# Altium PCB stabilizer_current_sense.PcbDoc (part 1 of 3)
Units mm, origin at the board's own origin, x right, y up, seen from the top; angles counter-clockwise.
Board outline 113.55 x 100 mm, 4 copper layers (Top, L2, L3, Bottom Layer), stack 1.579 mm thick; 206 components, 77 nets, 530 pads, 258 vias.
Unrouted connection lines stored in the file: 53.
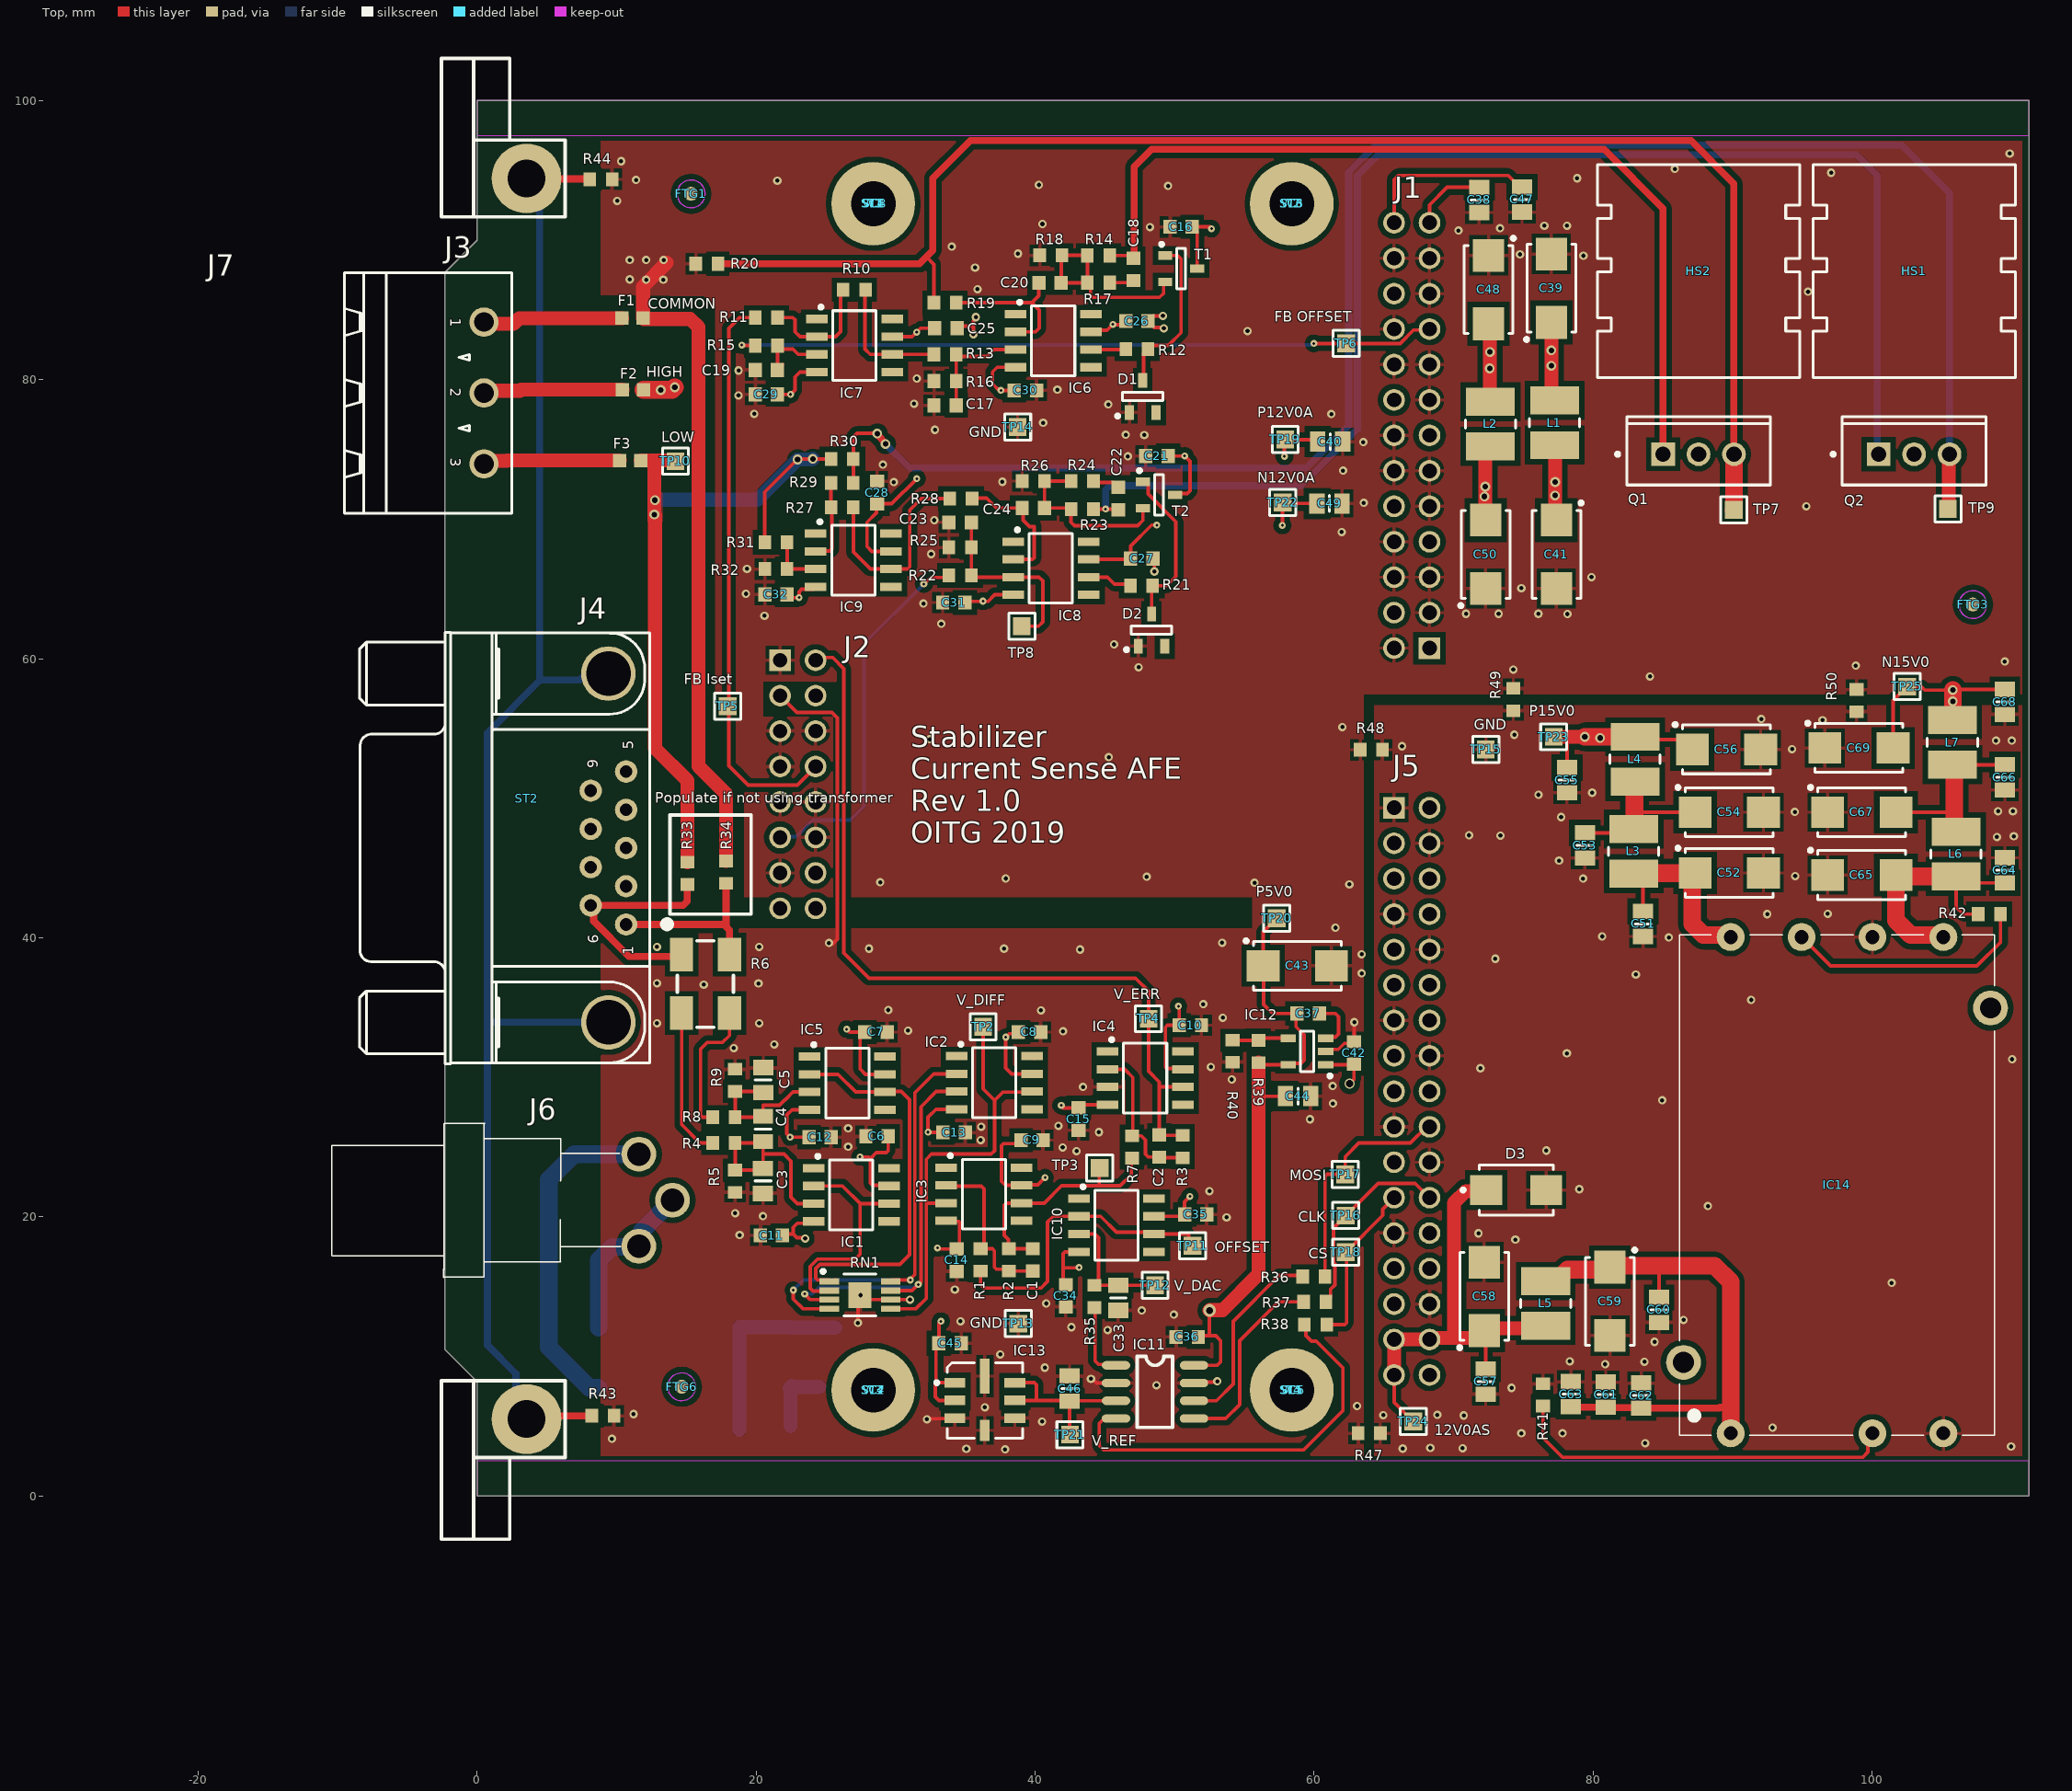
[diagram p0: Top view]
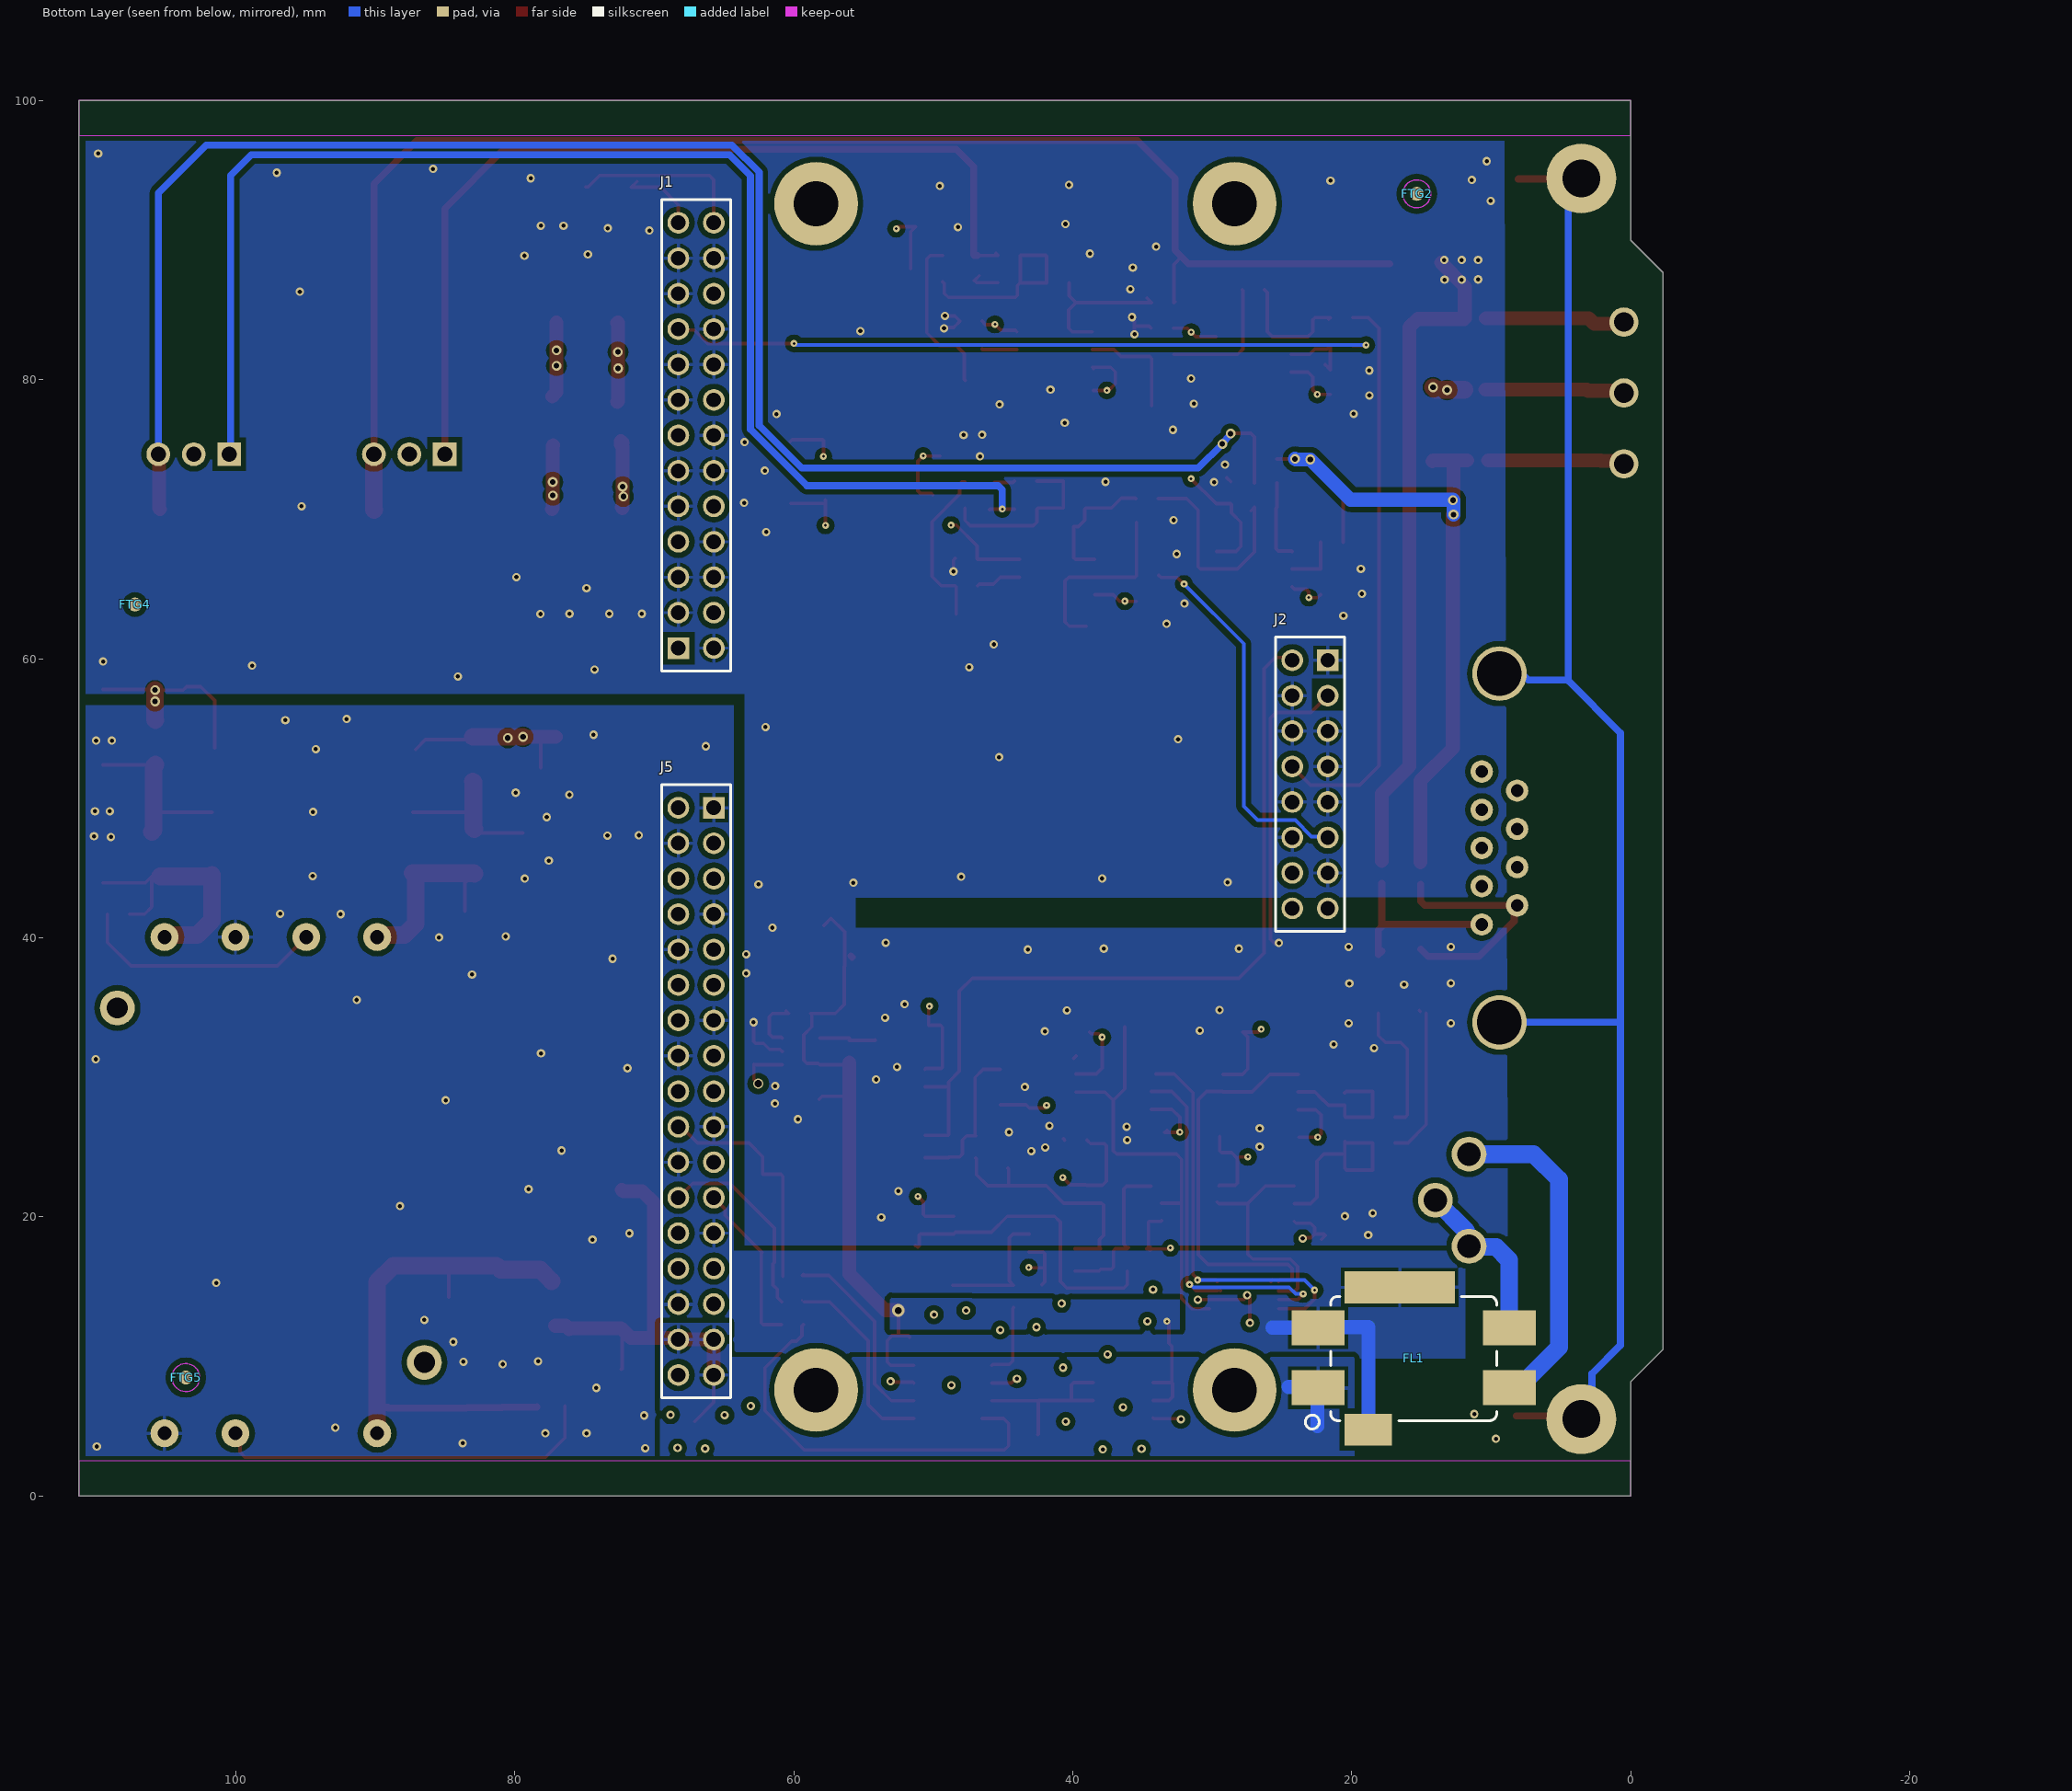
[diagram p1: Bottom Layer view, seen from below]
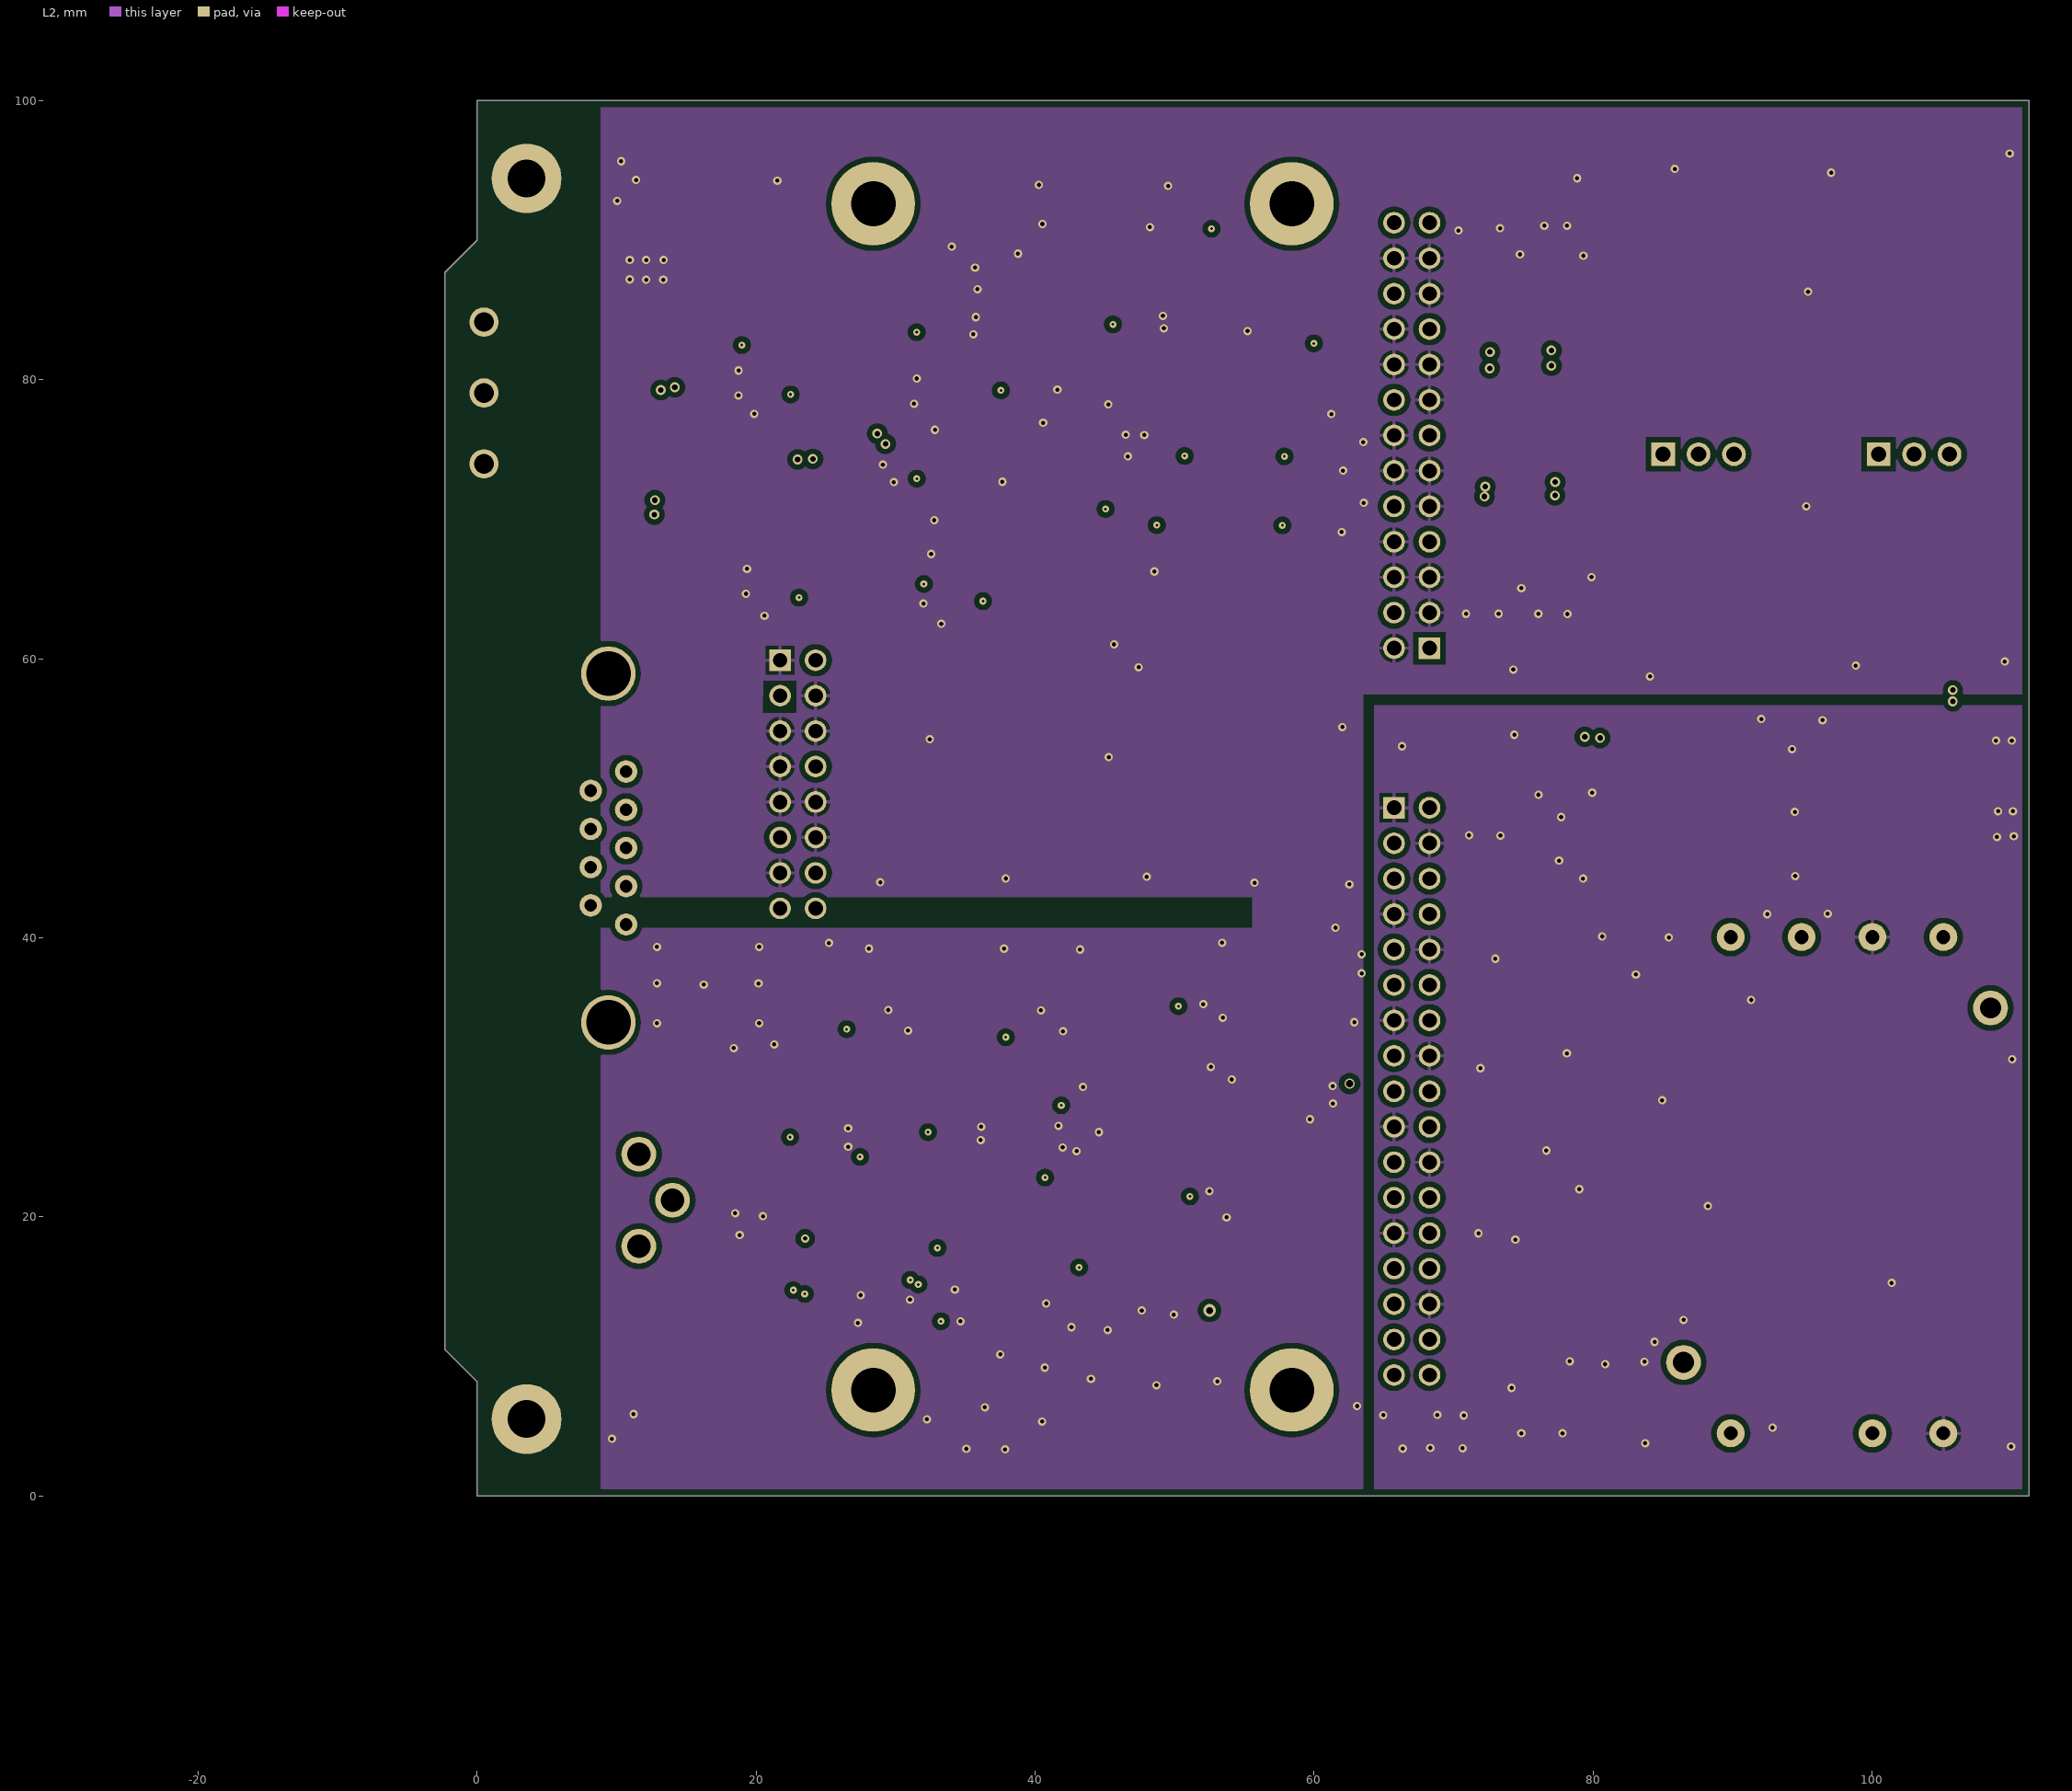
[diagram p2: L2]
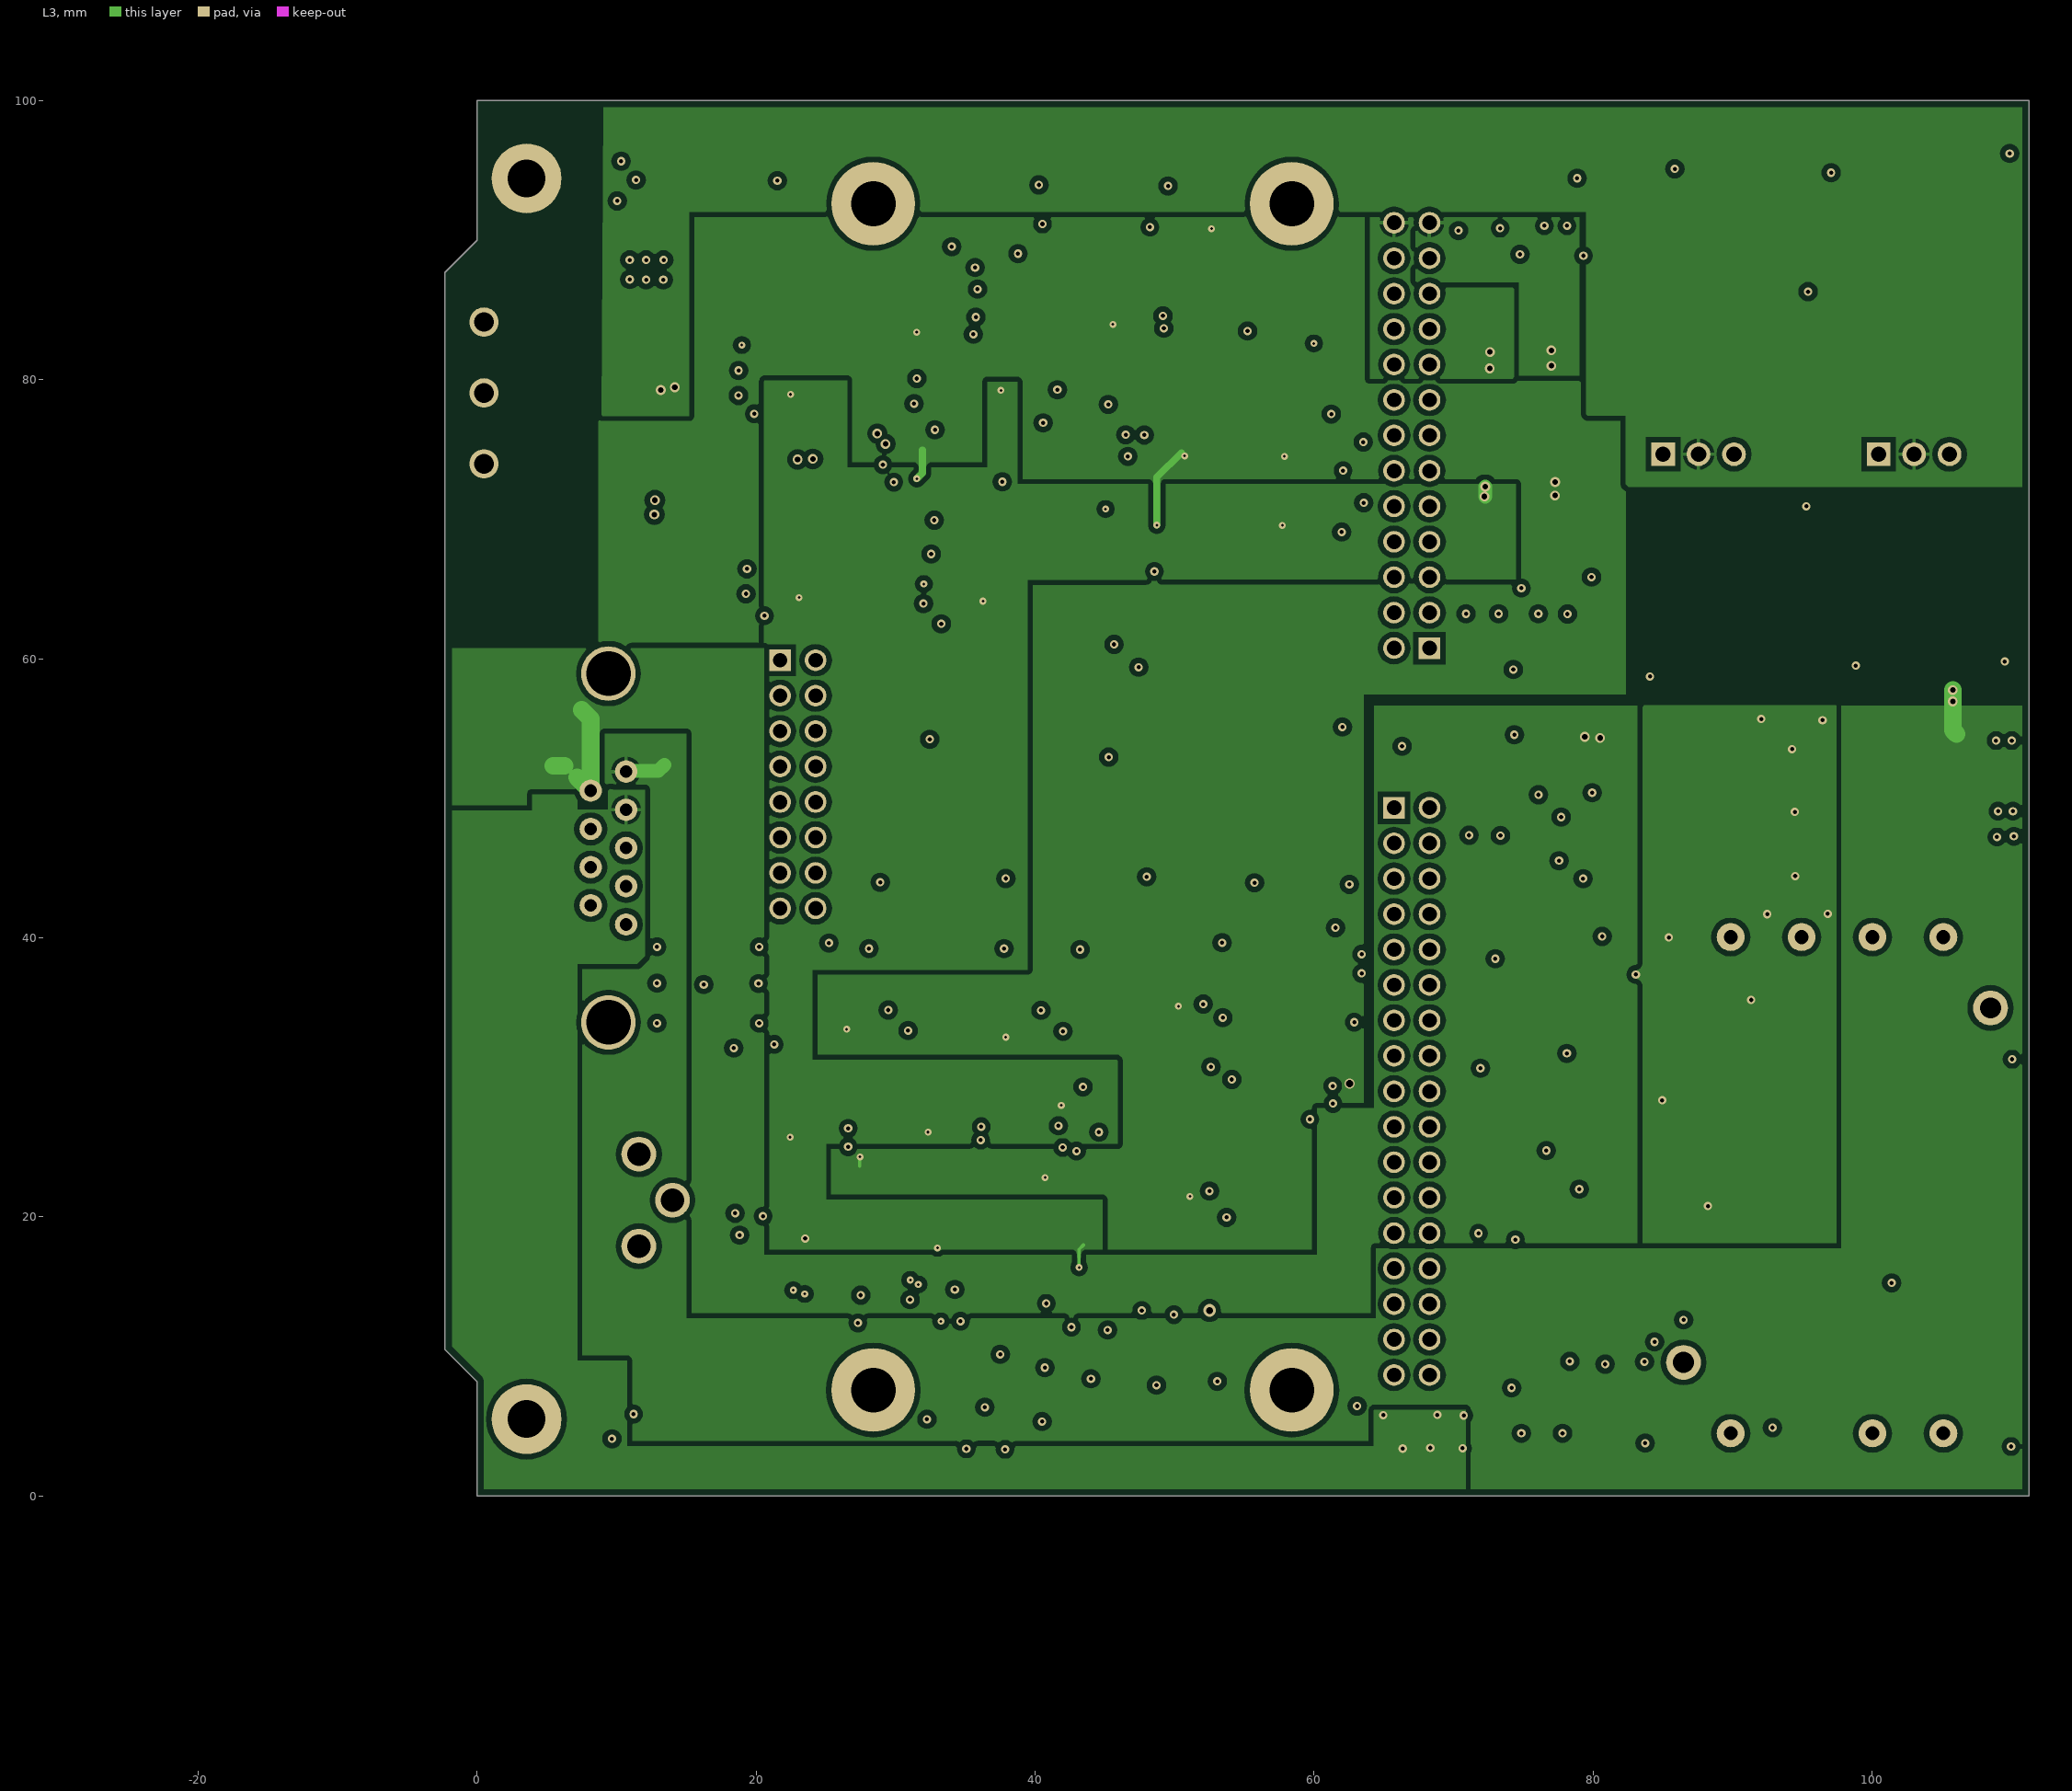
[diagram p3: L3]

## Layer stack, top to bottom
Top Solder: solder mask 0.0102, Solder Resist, Dk 3.5
Top: signal copper 0.0356
Dielectric1: core 0.18, FR-4, Dk 4.2
L2: signal copper 0.036
Dielectric3: prepreg 1.076, PP-015, Dk 4.2
L3: signal copper 0.036
Dielectric2: core 0.18, FR-4, Dk 4.2
Bottom Layer: signal copper 0.0356
Bottom Solder: solder mask 0.0102, Solder Resist, Dk 3.5

## Board outline
0,8.2 -2.3,10.5 -2.3,87.675 0,89.975 0,100 111.25,100 111.25,0 0,0

## Design rules (kind name [scope] priority, off if disabled: settings)
AcuteAngle [All] p1: minimum=6.00000000000000E+0001 checktracksonly=FALSE
BoardOutlineClearance BoardOutlineClearance_silk [(OnLayer('Top Overlay') OR OnLayer('Bottom Overlay'))] p1: gap=0 ignorepadtopadclearanceinfootprint=FALSE
BoardOutlineClearance BoardOutlineClearance_keepout [Keepout] p2: gap=0 ignorepadtopadclearanceinfootprint=FALSE
BoardOutlineClearance [All] p3: gap=0.254 ignorepadtopadclearanceinfootprint=FALSE except(0: Arc-SplitContinuation Track-SplitContinuation SMDPad-SplitContinuation THPad-SplitContinuation Via-SplitContinuation Fill-SplitContinuation Poly-SplitContinuation Region-SplitContinuation Text-SplitContinuation; 0.5: Arc-OutlineEdge Track-OutlineEdge SMDPad-OutlineEdge THPad-OutlineEdge Via-OutlineEdge Fill-OutlineEdge Poly-OutlineEdge Region-OutlineEdge Text-OutlineEdge)
Clearance outline_edge [OnLayer('Top Overlay')] p1: gap=-25.4 ignorepadtopadclearanceinfootprint=FALSE
Clearance Clearance_DIFF [(InDifferentialPairClass('All Differential Pairs'))] p2: gap=0.127 ignorepadtopadclearanceinfootprint=FALSE except(0.254: Arc-Poly Track-Poly SMDPad-Poly THPad-Poly Via-Poly Fill-Poly Poly-Poly Poly-Region Poly-Text Poly-Hole)
Clearance [All] p3: gap=0.127 ignorepadtopadclearanceinfootprint=FALSE except(0.381: Arc-Poly Track-Poly SMDPad-Poly THPad-Poly Via-Poly Fill-Poly Poly-Poly Poly-Region Poly-Text Poly-Hole)
HoleSize [All] p1: absolutevalues=TRUE maxlimit=3.81 minlimit=0.2 maxpercent=80.000 minpercent=20.000
HoleToHoleClearance [All] p1: gap=0.025 allowstackedmicrovias=TRUE
MinimumSolderMaskSliver [All] p1: minsoldermaskwidth=0
PlaneClearance PlaneClearance_outer [OnOutside] p1: clearance=0.254
PlaneClearance [All] p2: clearance=0.5
PlaneConnect [All] p1: pad.planeconnectstyle=Relief pad.reliefexpansion=0.508 pad.reliefentries=4 pad.reliefconductorwidth=0.254 pad.reliefairgap=0.254 via.planeconnectstyle=Direct via.reliefexpansion=0.508 via.reliefentries=4 via.reliefconductorwidth=0.254 via.reliefairgap=0.254
PolygonConnect PolygonConnect_pad [(InPadClass('All Pads'))] p1: connectstyle=Relief reliefconductorwidth=0.254 reliefentries=4 polygonreliefangle="90 Angle" airgapwidth=0.254
PolygonConnect [All] p2: connectstyle=Direct reliefconductorwidth=0.254 reliefentries=4 polygonreliefangle="90 Angle" airgapwidth=0.254
RoutingVias [All] p1: holewidth=0.2 width=0.5 viastyle="Through Hole" minholewidth=0.2 minwidth=0.5 maxholewidth=0.711 maxwidth=1.27
SilkToSolderMaskClearance [IsPad] p1: minsilkscreentomaskgap=0 clearancetoexposedcopper=TRUE
SolderMaskExpansion [All] p1: expansion=0.051
UnRoutedNet [All] p1: checkbadconnections=TRUE
Width [All] p1: maxlimit=1.27 minlimit=0.127 preferedwidth=0.127 minimp=50.000000 maximp=50.000000 favimp=50.000000
23 further rules are at their usual default settings.

## Classes and differential pairs
component class U_mechanics: FTG1 FTG2 FTG3 FTG4 FTG5 FTG6 J7 R43 R44 SC1 SC2 SC3 SC4 SC5 SC6 SC7 SC8 ST1 ST2 ST3 ST4 ST5 W1 W2 W3 W4
component class U_frontend: C1 C2 C3 C4 C5 C6 C7 C8 C9 C10 C11 C12 C13 C14 C15 IC1 IC2 IC3 IC4 IC5 R1 R2 R3 R4 R5 R6 R7 R8 R9 RN1 TP2 TP3 TP4
component class U_power_supplies: C37 C38 C39 C40 C41 C42 C43 C44 C45 C46 C47 C48 C49 C50 C51 C52 C53 C54 C55 C56 C57 C58 C59 C60 C61 C62 C63 C64 C65 C66 C67 C68 C69 IC12 IC13 IC14 L1 L2 L3 L4 L5 L6 L7 p15v0 R39 R40 R41 R42 R47 R48 R49 R50 TP19 TP20 TP21 TP22 TP23 TP24 TP25
component class U_shunts: C16 C17 C18 C19 C20 C21 C22 C23 C24 C25 C26 C27 C28 C29 C30 C31 C32 D1 D2 FF_ISET_DIV HS1 HS2 IC6 IC7 IC8 IC9 Q1 Q2 R10 R11 R12 R13 R14 R15 R16 R17 R18 R19 R20 R21 R22 R23 R24 R25 R26 R27 R28 R29 R30 R31 R32 T1 T2 TP5 TP6 TP7 TP8 TP9
component class stabilizer_current_sense: C33 C34 C35 C36 D3 F1 F2 F3 FL1 IC10 IC11 J1 J2 J3 J4 J5 J6 R33 R34 R35 R36 R37 R38 TP10 TP11 TP12 TP13 TP14 TP15 TP16 TP17 TP18

## Components (designator, comment, footprint, x,y, rotation, side; value= is the part's Value field where it differs from the comment)
C1 "8.2pF" CAPC1608X87N 39.834,16.922 r90 top
C2 "43pF" CAPC1608X87N 48.9,25.079 r90 top
C3 "4.7nF" CAPC2012X95N 20.5,22.581 r90 top
C4 "47nF" CAPC2012X135N 20.5,26.302 r270 top
C5 "4.7nF" CAPC2012X95N 20.519,29.801 r270 top
C6 "100nF" CAPC1608X87N 28.669,25.779 r0 top
C7 "100nF" CAPC1608X87N 28.6,33.246 r180 top
C8 "100nF" CAPC1608X87N 39.6,33.246 r180 top
C9 "100nF" CAPC1608X87N 39.784,25.502 r180 top
C10 "100nF" CAPC1608X87N 51.131,33.735 r180 top
C11 "100nF" CAPC1608X87N 21.1,18.675 r0 top
C12 "100nF" CAPC1608X87N 24.592,25.714 r180 top
C13 "100nF" CAPC1608X87N 34.2,26.05 r180 top
C14 "100nF" CAPC1608X87N 34.379,16.9 r90 top
C15 "100nF" CAPC1608X87N 43.113,27.012 r90 top
C16 "100nF" CAPC1608X87N 50.465,90.942 r0 top
C17 "330pF" CAPC1608X87N 33.55,78.142 r0 top
C18 "4.7nF" CAPC1608X87N 47.05,87.892 r90 top
C19 "1uF" CAPC1608X87N 20.74,80.687 r0 top
C20 "15pF" CAPC1608X87N 41.07,86.925 r0 top
C21 "100nF" CAPC1608X87N 48.73,74.525 r0 top
C22 "4.7nF" CAPC1608X87N 45.961,71.475 r270 top
C23 "33nF" CAPC1608X87N 34.63,69.765 r0 top
C24 "15pF" CAPC1608X87N 39.875,70.8 r0 top
C25 "100nF" CAPC1608X87N 33.6,83.687 r180 top
C26 "100nF" CAPC1608X87N 47.3,84.187 r180 top
C27 "100nF" CAPC1608X87N 47.65,67.175 r180 top
C28 "100nF" CAPC1608X87N 28.681,71.9 r270 top
C29 "100nF" CAPC1608X87N 20.74,78.937 r0 top
C30 "100nF" CAPC1608X87N 39.308,79.225 r180 top
C31 "100nF" CAPC1608X87N 34.175,64.025 r0 top
C32 "100nF" CAPC1608X87N 21.426,64.598 r0 top
C33 "10uF" CAPC2012X95N 45.964,14.2 r90 top
C34 "100nF" CAPC1608X87N 42.2,14.343 r270 top
C35 "100nF" CAPC1608X87N 51.514,20.177 r180 top
C36 "100nF" CAPC1608X87N 50.9,11.4 r0 top
C37 "10nF" CAPC1608X87N 59.575,34.575 r180 top
C38 "10uF" CAPC2012X95N 71.825,92.875 r90 top
C39 "10uF" CAPMP6032X280N 77,86.55 r90 top
C40 "10uF" CAPC2012X95N 61.15,75.55 r180 top
C41 "10uF" CAPMP6032X280N 77.36,67.48 r270 top
C42 "100nF" CAPC1608X87N 62.85,31.75 r270 top
C43 "10uF" CAPMP6032X280N 58.8,38 r0 top
C44 "10uF" CAPC2012X95N 58.85,28.65 r180 top
C45 "100nF" CAPC1608X87N 33.905,10.95 r180 top
C46 "10uF" CAPC2012X95N 42.475,7.7 r270 top
C47 "10uF" CAPC2012X95N 74.9,92.9 r90 top
C48 "10uF" CAPMP6032X280N 72.5,86.45 r270 top
C49 "10uF" CAPC2012X95N 61.1,71.125 r180 top
C50 "10uF" CAPMP6032X280N 72.29,67.48 r90 top
C51 "10uF" CAPC2012X95N 83.573,41 r90 top
C52 "10uF" CAPMP6032X280N 89.75,44.65 r0 top
C53 "10uF" CAPC2012X95N 79.4,46.622 r90 top
C54 "10uF" CAPMP6032X280N 89.75,49 r0 top
C55 "10uF" CAPC2012X95N 78.123,51.3 r90 top
C56 "10uF" CAPMP6032X280N 89.55,53.5 r0 top
C57 "10uF" CAPC2012X95N 72.3,8.2 r90 top
C58 "10uF" CAPMP6032X280N 72.2,14.308 r90 top
C59 "10uF" CAPMP6032X280N 81.2,13.95 r270 top
C60 "10uF" CAPC2012X95N 84.72,13.342 r90 top
C61 "10uF" CAPC2012X95N 80.9,7.262 r270 top
C62 "10uF" CAPC2012X95N 83.442,7.2 r270 top
C63 "10uF" CAPC2012X95N 78.4,7.3 r270 top
C64 "10uF" CAPC2012X95N 109.5,44.835 r270 top
C65 "10uF" CAPMP6032X280N 99.25,44.5 r0 top
C66 "10uF" CAPC2012X95N 109.5,51.5 r90 top
C67 "10uF" CAPMP6032X280N 99.25,49 r0 top
C68 "10uF" CAPC2012X95N 109.5,56.9 r90 top
C69 "10uF" CAPMP6032X280N 99.05,53.6 r0 top
D1 "BAT54" SOT95P240X130-3N 47.715,78.792 r90 top
D2 "BAT54" SOT95P240X130-3N 48.35,62.05 r90 top
D3 "SMBJ12A" DIOM5336X265N 74.48,21.93 r0 top
F1 "500mA-50V" FUSC1608X55N 11.15,84.4 r180 top
F2 "500mA-50V" FUSC1608X55N 11.175,79.275 r180 top
F3 "500mA-50V" FUSC1608X55N 10.975,74.2 r180 top
FL1 "10A/50VDC" FIL_MURATA_BNX02 15.567,9.856 r0 bottom
FTG1 "Use only in PCB" FIDUCIAL_TOP_C100-200#1 15.34,93.31 r90 top
FTG2 "Use only in PCB" FIDUCIAL_TOP_C100-200#1 15.34,93.31 r90 bottom
FTG3 "Use only in PCB" FIDUCIAL_TOP_C100-200#1 107.21,63.88 r90 top
FTG4 "Use only in PCB" FIDUCIAL_TOP_C100-200#2 107.21,63.88 r90 top
FTG5 "Use only in PCB" FIDUCIAL_TOP_C100-200#1 103.57,8.49 r90 bottom
FTG6 "Use only in PCB" FIDUCIAL_TOP_C100-200#1 14.67,7.83 r90 top
HS1 "Heat Sink No Pad" "HSINK_FISCHER_FK 242 SA 220 O_h" 103,87.775 r0 top
HS2 "Heat Sink No Pad" "HSINK_FISCHER_FK 242 SA 220 O_h" 87.55,87.775 r0 top
IC1 "LT1007CS8#PBF" SOIC127P600X175-8N 26.828,21.587 r0 top
IC2 "LT1007CS8#PBF" SOIC127P600X175-8N 37.079,29.617 r0 top
IC3 "LT1007CS8#PBF" SOIC127P600X175-8N 36.329,21.627 r0 top
IC4 "LT1007CS8#PBF" SOIC127P600X175-8N 47.891,29.951 r0 top
IC5 "LT1007CS8#PBF" SOIC127P600X175-8N 26.543,29.587 r0 top
IC6 "LT1007CS8#PBF" SOIC127P600X175-8N 41.3,82.787 r0 top
IC7 "LT1007CS8#PBF" SOIC127P600X175-8N 27.05,82.437 r0 top
IC8 "LT1007CS8#PBF" SOIC127P600X175-8N 41.13,66.48 r0 top
IC9 "LT1007CS8#PBF" SOIC127P600X175-8N 26.976,67.058 r0 top
IC10 "LT1007CS8#PBF" SOIC127P600X175-8N 45.834,19.407 r0 top
IC11 "AD5541" so-8 45.8,9.367 r0 top
IC12 "LT1761ES5-BYP#TRMPBF" SOT95P280X100-5N 59.482,31.857 r180 top
IC13 "LTC6655BHLS8-2.5" LT_LS8 36.4,6.853 r0 top
IC14 "CC10-1212DF-E" CC10-1212DF-E 86.475,9.575 r90 top
J1 "ESW-108-23-L-D" ESW-113-23-L-D 67,76 r90 bottom locked
J2 "ESW-108-23-L-D" ESW-108-23-L-D 23,51 r270 bottom locked
J3 "MSTBA" PHOENIX_1757255 0.5,79.045 r270 top
J4 "D-Sub 9F" FCI_D09S13A4GV00LF 9.42,46.435 r90 top locked
J5 "ESW-108-23-L-D" ESW-117-23-L-D 67,29 r270 bottom locked
J6 "Jack" SWITCHCRAFT_L712RA 11.6,24.5 r0 top
J7 "Family" PHOENIX_1757022 -19.5,86.675 r270 top
L1 "10uH" IND_MURATA-PS_8400 77.23,76.9 r270 top
L2 "10uH" IND_MURATA-PS_8400 72.639,76.813 r270 top
L3 "10uH" IND_MURATA-PS_8400 82.9,46.2 r90 top
L4 "10uH" IND_MURATA-PS_8400 83,52.8 r90 top
L5 "10uH" IND_MURATA-PS_8400 76.6,13.8 r90 top
L6 "10uH" IND_MURATA-PS_8400 106,46 r90 top
L7 "10uH" IND_MURATA-PS_8400 105.75,54 r90 top
Q1 "TIP29A" ONSC-TO-220-3-221A-09 87.55,74.65 r90 top
Q2 "TIP29A" ONSC-TO-220-3-221A-09 103,74.65 r90 top
R1 "1k" RESC1608X55N 36.094,16.922 r90 top
R2 "100k" RESC1608X55N 38.124,16.922 r90 top
R3 "20k" RESC1608X55N 50.581,25.041 r90 top
R4 "16" RESC1608X55N 17.7,25.301 r0 top
R5 "10k" RESC1608X55N 18.5,22.56 r90 top
R6 "Y160710R0000D9R" VCS1625Z 14.67,38.79 r270 top
R7 "1k" RESC1608X55N 46.943,25.012 r90 top
R8 "16" RESC1608X55N 17.7,27.15 r0 top
R9 "10k" RESC1608X55N 18.5,29.791 r270 top
R10 "470" RESC1608X55N 27.05,86.437 r0 top
R11 "10k" RESC1608X55N 20.74,84.437 r0 top
R12 "1k" RESC1608X55N 47.3,82.187 r0 top
R13 "10k" RESC1608X55N 33.55,81.802 r0 top
R14 "470" RESC1608X55N 44.55,88.892 r0 top
R15 "10k" RESC1608X55N 20.74,82.437 r0 top
R16 "470" RESC1608X55N 33.55,79.892 r0 top
R17 "0" RESC1608X55N 44.55,86.948 r0 top
R18 "470" RESC1608X55N 41.125,88.9 r0 top
R19 "1k" RESC1608X55N 33.55,85.512 r180 top
R20 "2" RESC1608X55N 16.475,88.3 r0 top
R21 "1k" RESC1608X55N 47.63,65.225 r0 top
R22 "24k" RESC1608X55N 34.63,65.975 r0 top
R23 "470" RESC1608X55N 43.38,70.725 r0 top
R24 "0" RESC1608X55N 43.38,72.725 r0 top
R25 "470" RESC1608X55N 34.63,67.975 r0 top
R26 "470" RESC1608X55N 39.88,72.725 r0 top
R27 "1k" RESC1608X55N 26.176,70.848 r180 top
R28 "1k" RESC1608X55N 34.68,71.475 r180 top
R29 "1k" RESC1608X55N 26.176,72.598 r0 top
R30 "10" RESC1608X55N 26.176,74.3 r0 top
R31 "1k" RESC1608X55N 21.426,68.348 r180 top
R32 "1k" RESC1608X55N 21.426,66.423 r0 top
R33 "0" RESC1608X55N 15.075,44.626 r270 top
R34 "0" RESC1608X55N 17.85,44.7 r270 top
R35 "0" RESC1608X55N 44.243,14.298 r90 top
R36 "0" RESC1608X55N 59.975,15.725 r180 top
R37 "0" RESC1608X55N 60.05,13.915 r180 top
R38 "0" RESC1608X55N 60.1,12.275 r0 top
R39 "6k2" RESC1608X55N 56.025,31.85 r270 top
R40 "2k" RESC1608X55N 54.15,31.875 r90 top
R41 "0" RESC1608X55N 76.4,7.25 r270 top
R42 "0" RESC1608X55N 108.394,41.7 r0 top
R43 "0" RESC1608X55N 9.025,5.75 r180 top
R44 "0" RESC1608X55N 8.886,94.35 r180 top
R47 "0" RESC1608X55N 63.95,4.495 r0 top
R48 "0" RESC1608X55N 64.1,53.475 r0 top
R49 "0" RESC1608X55N 74.275,57.075 r270 top
R50 "0" RESC1608X55N 98.875,57 r270 top
RN1 "1k" SOP65P490X110-9N-R168X188 27.455,14.4 r0 top
SC1 "SCREW_M3_CAP_8mm" SCREW_M3_CAP_8mm 58.4,7.6 r0 top
SC2 "SCREW_M3_CAP_8mm" SCREW_M3_CAP_8mm 28.4,7.6 r0 top
SC3 "SCREW_M3_CAP_8mm" SCREW_M3_CAP_8mm 58.4,92.6 r0 top
SC4 "SCREW_M3_CAP_8mm" SCREW_M3_CAP_8mm 28.4,92.6 r0 top
SC5 "SCREW_M3_CAP_8mm" SCREW_M3_CAP_8mm 58.516,7.6 r180 top
SC6 "SCREW_M3_CAP_8mm" SCREW_M3_CAP_8mm 58.4,92.6 r0 top
SC7 "SCREW_M3_CAP_8mm" SCREW_M3_CAP_8mm 28.4,7.6 r0 top
SC8 "SCREW_M3_CAP_8mm" SCREW_M3_CAP_8mm 28.516,92.6 r0 top
ST1 "M3 8mm" R30-1001802 28.4,92.6 r180 top
ST2 "SCHROFF_PANEL_3U_4HP_EMI" SCHROFF_PANEL_3HP_4U 3.556,5.512 r0 top locked
ST3 "M3 8mm" R30-1001802 58.4,92.6 r180 top
ST4 "M3 8mm" R30-1001802 28.4,7.6 r180 top
ST5 "M3 8mm" R30-1001802 58.4,7.6 r180 top
T1 "BC846B" SOT95P230X110-3N 50.465,87.942 r0 top
T2 "BC846B" SOT95P230X110-3N 48.88,71.725 r0 top
TP2 "Test Point" TPS127 36.276,33.625 r0 top
TP3 "Test Point" TPS127 44.637,23.5 r0 top
TP4 "Test Point" TPS127 48.133,34.2 r0 top
TP5 "Test Point" TPS127 17.975,56.6 r0 top
TP6 "Test Point" TPS127 62.3,82.591 r0 top
TP7 "Test Point" TPS127 90.075,70.675 r0 top
TP8 "Test Point" TPS127 39.05,62.325 r90 top
TP9 "Test Point" TPS127 105.425,70.725 r90 top
TP10 "Test Point" TPS127 14.225,74.15 r90 top
TP11 "Test Point" TPS127 51.287,17.941 r90 top
TP12 "Test Point" TPS127 48.6,15.098 r90 top
TP13 "Test Point" TPS127 38.79,12.357 r90 top
TP14 "Test Point" TPS127 38.75,76.6 r90 top
TP15 "Test Point" TPS127 72.303,53.5 r90 top
TP16 "Test Point" TPS127 62.268,20.1 r90 top
TP17 "Test Point" TPS127 62.225,23.05 r90 top
TP18 "Test Point" TPS127 62.268,17.466 r90 top
TP19 "Test Point" TPS127 57.925,75.7 r0 top
TP20 "Test Point" TPS127 57.325,41.402 r90 top
TP21 "Test Point" TPS127 42.5,4.4 r0 top
TP22 "Test Point" TPS127 57.75,71.2 r0 top
TP23 "Test Point" TPS127 77.171,54.4 r90 top
TP24 "Test Point" TPS127 67.1,5.346 r90 top
TP25 "Test Point" TPS127 102.5,58 r90 top
W1 "washer_M3_6mm_0.8mm" washer_M3_6mm_0.8mm 28.4,92.6 r180 top
W2 "washer_M3_6mm_0.8mm" washer_M3_6mm_0.8mm 58.4,92.6 r180 top
W3 "washer_M3_6mm_0.8mm" washer_M3_6mm_0.8mm 28.4,7.6 r180 top
W4 "washer_M3_6mm_0.8mm" washer_M3_6mm_0.8mm 58.4,7.6 r180 top

## Footprints (in the part's own frame and the unit in brackets; to place one, negate y for a bottom-side part, rotate by r counter-clockwise, add the part's x,y. Pads: shape width x height; smd on the part's side, far side on the other; paste and mask are expansions set on the pad)
CAPC1608X87N [mm] "Chip Capacitor, Body 1.6x0.8mm IPC Medium Density"
  rect 0.95x1 smd: 1(-0.8,0) 2(0.8,0)
  body extent -0.87,-0.47 0.88,0.48, height 0.87
CAPC2012X95N [mm] "Chip Capacitor, Body 2.0x1.25mm, IPC Medium Density"
  rect 1.1x1.45 smd: 1(-0.9,0) 2(0.9,0)
  silkscreen extent 0,-0.58 0,0.58, body extent -1.05,-0.67 1.05,0.68, height 0.95
CAPC2012X135N [mm] "Chip Capacitor, Body 2.0x1.25mm, IPC Medium Density"
  rect 1.05x1.4 smd: 1(-0.9,0) 2(0.9,0)
  silkscreen extent 0,-0.58 0,0.58, body extent -1.05,-0.67 1.05,0.68, height 1.25
CAPMP6032X280N [mm] "Capacitor, Polarized, Molded  Body 6.0x3.2mm, IPC Medium Density"
  rect 2.35x2.25 smd: 1(-2.45,0) 2(2.45,0)
  silkscreen extent -3.8,-1.75 3.15,1.9, body extent -3.15,-1.75 3.15,1.75, height 2.8
CC10-1212DF-E [mm]
  round 2 hole 1: 1(-5.08,-3.38) 2(-5.08,-13.54) 3(-5.08,-18.62) 4(30.48,-18.62) 5(30.48,-13.54) 6(30.48,-8.46) 7(30.48,-3.38)
  round 2.5 hole 1.5: 8(0,0) 9(25.4,-22)
  silkscreen extent -5.23,-22.3 30.63,0.3, body extent -5.23,-22.3 30.63,0.3, height 8.5
DIOM5336X265N [mm] "DO-214-AA/SMB Diode, Molded Body; 5.34mm L X 3.625mm W X 2.65mm H, IPC Medium Density"
  rect 2.3x2.15 smd: 1(-2.15,0) 2(2.15,0)
  silkscreen extent -3.92,-1.8 2.65,1.8, body extent -2.7,-1.95 2.7,1.95, height 2.4
ESW-108-23-L-D [mm] "Samtec Elevated Socket, 2x8 Pins, Vertical, 2.54mm Pitch, Female, 13.59mm length"
  rect 1.55x1.55 hole 1.04: 1(-8.89,1.27)
  round 1.55 hole 1.04: 2(-8.89,-1.27) 3(-6.35,1.27) 4(-6.35,-1.27) 5(-3.81,1.27) 6(-3.81,-1.27) 7(-1.27,1.27) 8(-1.27,-1.27) 9(1.27,1.27) 10(1.27,-1.27) 11(3.81,1.27) 12(3.81,-1.27) 13(6.35,1.27) 14(6.35,-1.27) 15(8.89,1.27) 16(8.89,-1.27)
  silkscreen extent -10.54,-2.47 10.54,2.47, body extent -10.41,-2.54 10.41,2.54, height 14.84
ESW-113-23-L-D [mm] "Samtec Elevated Socket, 2x8 Pins, Vertical, 2.54mm Pitch, Female, 13.59mm length"
  rect 1.55x1.55 hole 1.04: 1(-15.24,1.27)
  round 1.55 hole 1.04: 2(-15.24,-1.27) 3(-12.7,1.27) 4(-12.7,-1.27) 5(-10.16,1.27) 6(-10.16,-1.27) 7(-7.62,1.27) 8(-7.62,-1.27) 9(-5.08,1.27) 10(-5.08,-1.27) 11(-2.54,1.27) 12(-2.54,-1.27) 13(0,1.27) 14(0,-1.27) 15(2.54,1.27) 16(2.54,-1.27) 17(5.08,1.27) 18(5.08,-1.27) 19(7.62,1.27) 20(7.62,-1.27) 21(10.16,1.27) 22(10.16,-1.27) 23(12.7,1.27) 24(12.7,-1.27) 25(15.24,1.27) 26(15.24,-1.27)
  silkscreen extent -16.89,-2.47 16.89,2.47, body extent -16.76,-2.54 16.76,2.54, height 14.84
ESW-117-23-L-D [mm] "Samtec Elevated Socket, 2x17 Pins, Vertical, 2.54mm Pitch, Female, 13.59mm length"
  rect 1.55x1.55 hole 1.04: 1(-20.32,1.27)
  round 1.55 hole 1.04: 2(-20.32,-1.27) 3(-17.78,1.27) 4(-17.78,-1.27) 5(-15.24,1.27) 6(-15.24,-1.27) 7(-12.7,1.27) 8(-12.7,-1.27) 9(-10.16,1.27) 10(-10.16,-1.27) 11(-7.62,1.27) 12(-7.62,-1.27) 13(-5.08,1.27) 14(-5.08,-1.27) 15(-2.54,1.27) 16(-2.54,-1.27) 17(0,1.27) 18(0,-1.27) 19(2.54,1.27) 20(2.54,-1.27) 21(5.08,1.27) 22(5.08,-1.27) 23(7.62,1.27) 24(7.62,-1.27) 25(10.16,1.27) 26(10.16,-1.27) 27(12.7,1.27) 28(12.7,-1.27) 29(15.24,1.27) 30(15.24,-1.27) 31(17.78,1.27) 32(17.78,-1.27) 33(20.32,1.27) 34(20.32,-1.27)
  silkscreen extent -21.97,-2.47 21.97,2.47, body extent -21.84,-2.54 21.84,2.54, height 14.84
FCI_D09S13A4GV00LF [mm] "Right Angled D-SUB 9 Female Contacts for PCB  with Harpoons and Female Screwlock (UNC4-40) and Elec. Continuity"
  round 1.6 hole 0.9: 1(-5.48,-1.27) 2(-2.74,-1.27) 3(0,-1.27) 4(2.74,-1.27) 5(5.48,-1.27) 6(-4.11,1.27) 7(-1.37,1.27) 8(1.37,1.27) 9(4.11,1.27)
  round 3.9 hole 3.2: 10(-12.495,0) 11(12.495,0)
  silkscreen extent -15.46,-4.45 15.45,17.85, body extent -15.45,-2.95 15.45,17.85, height 13.45
FIDUCIAL_TOP_C100-200#1 [mm] "Round Fiducial Target, Top Layer, 1.0mm, Top Solder 2.0mm, Keepout =2.0mm"
  round 1 smd paste-0.51 mask+0.5: FTG2(0,0)
  Top keep-out circle w0.1: c0,0 r1
FIDUCIAL_TOP_C100-200#2 [mm] "Round Fiducial Target, Top Layer, 1.0mm, Top Solder 2.0mm, Keepout =2.0mm"
  round 1 smd far side paste-0.51 mask+0.5: FTG2(0,0)
  Top keep-out circle w0.1: c0,0 r1
FIL_MURATA_BNX02 [mm] "Block Type EMIFIL LC Combined Type, BNX02* Series"
  rect 3.8x2.5 smd: 1(-6.85,2.1) 2(6.85,2.1) 3(-6.85,-2.2) 4(6.85,-2.2)
  rect 7.9x2.3 smd: 4(1,-5.1)
  rect 3.4x2.3 smd: 4(3.25,5.1)
  silkscreen extent -5.95,-4.45 7.77,5.05, body extent -6.05,-4.55 6.05,4.55, height 3.1
FUSC1608X55N [mm] "Chip Fuse, 2-Leads, Body 1.6mm x 0.8mm, IPC Medium Density"
  rect 0.95x0.95 smd: 1(-0.75,0) 2(0.75,0)
  body extent -0.85,-0.45 0.85,0.45, height 0.5
"HSINK_FISCHER_FK 242 SA 220 O_h" [mm] "TO-220 Heat Sink  Rth: 26°C/W - Horizontal Mount"
  silkscreen extent -7.25,-7.62 7.25,7.62, body extent -7.25,-7.62 7.25,7.62, height 12.71
IND_MURATA-PS_8400 [mm] "Miniature Surface Mount Power Inductors, 4.5mm L X 3.3mm W X 2.9mm H, MURATA 8400 Series"
  rect 2x3.5 smd: 1(-1.6,0) 2(1.6,0)
  silkscreen extent -0.3,-1.8 0.3,1.8, body extent -2.4,-1.8 2.4,1.8, height 2.9
LT_LS8 [mm] "8-pin ceramic LCC"
  rect 1.5x0.7 smd: 1(-2.15,1.27) 2(-2.15,0) 3(-2.15,-1.27) 5(2.15,-1.27) 6(2.15,0) 7(2.15,1.27)
  rect 0.7x1.5 smd: 4(0,-2.15)
  rect 0.7x2.5 smd: 8(0,1.742)
  silkscreen extent -3.57,-2.7 2.7,2.7, body extent -2.5,-2.5 2.5,2.5, height 1.45
ONSC-TO-220-3-221A-09 [mm] "FM, 3-Leads, Body 10.3x4.85mm, Pitch 2.54mm"
  rect 1.7x1.7 hole 1.1: 1(0,2.54)
  round 1.7 hole 1.1: 2(0,0) 3(0,-2.54)
  silkscreen extent -2.2,-5.15 2.7,5.92, body extent -2.18,-5.15 2.67,5.15, height 19.85
PHOENIX_1757022 [mm] "Phoenix Contact 5.08mm pitch terminal plug, 3 ways"
  body extent 0,-0.1 15.24,18.2, height 15.14
PHOENIX_1757255 [mm] "PHOENIX MSTBA Serie, Pitch 5.08mm, 12A, 250V, 3 Positions Header"
  round 2.1 hole 1.4: 1(-5.08,0) 2(0,0) 3(5.08,0)
  silkscreen extent -8.62,-10 8.62,2, body extent -8.62,-10 8.62,2, height 8.6
R30-1001802 [mm] "Harwin R30-100 18mm hex standoff"
  body extent -2.83,-2.45 2.83,2.45, height 18.8
RESC1608X55N [mm] "Chip Resistor, EIA 0603, Metric 1608, Body 1.6x0.8mm, IPC Medium Density"
  rect 0.9x1 smd: 1(-0.8,0) 2(0.8,0)
  body extent -0.87,-0.47 0.88,0.48, height 0.55
SCHROFF_PANEL_3HP_4U [mm] "Schroff PCB 3HP 4U Eurocard Panel Kit"
  round 5 hole 2.7: 0(0,0) 1(0,88.9)
  silkscreen extent -6.1,-8.6 2.75,97.5, body extent -22.6,-12.57 2.5,97.5, height 15.6
SCREW_M3_CAP_8mm [mm] "Accu Limited SSCF-M3-8-12.9-Z"
  body extent -2.75,-2.75 2.75,2.75, height 3
so-8 [mil]
  oval 80x24 smd: 1(0,0) 2(0,-50) 3(0,-100) 4(0,-150) 5(220,-150) 6(220,-100) 7(220,-50) 8(220,0)
  silkscreen extent 60,-175 160,25, body extent -14,-173 230,24, height 69
SOIC127P600X175-8N [mm] "SOIC 8, Pitch 1.27mm - Body 4x5mm, IPC Medium Density"
  rect 1.55x0.6 smd: 1(-2.7,1.905) 2(-2.7,0.635) 3(-2.7,-0.635) 4(-2.7,-1.905) 5(2.7,-1.905) 6(2.7,-0.635) 7(2.7,0.635) 8(2.7,1.905)
  silkscreen extent -2.52,-2.5 1.55,2.88, body extent -3.1,-2.5 3.1,2.5, height 1.75
SOP65P490X110-9N-R168X188 [mm] "SOP, 0.65mm Pitch; 8 Pin, 3.00mm W X 3.00mm L X 1.10mm H body, (w/Thermal Tab 1.68X 1.88mm), IPC Medium Density"
  rect 1.4x0.45 smd: 1(-2.2,0.975) 2(-2.2,0.325) 3(-2.2,-0.325) 4(-2.2,-0.975) 5(2.2,-0.975) 6(2.2,-0.325) 7(2.2,0.325) 8(2.2,0.975)
  rect 1.65x1.85 smd: 9(0,0)
  silkscreen extent -2.77,-1.5 1.15,1.82, body extent -2.45,-1.55 2.45,1.55, height 1.1
SOT95P230X110-3N [mm] "SOT23, 3 pin, Pitch 0.95mm - 1.3mm W X 2.9mm L X 1.1mm H, IPC Medium Density"
  rect 1x0.6 smd: 1(-1.15,0.95) 2(-1.15,-0.95) 3(1.15,0)
  silkscreen extent -1.52,-1.45 0.33,1.87, body extent -1.08,-1.5 1.25,1.5, height 1.1
SOT95P240X130-3N [mm] "SOT23 3-Leads, Pitch 0.95mm - Body 1.3x2.9mm, IPC Medium Density"
  rect 1.05x0.65 smd: 1(-1.15,0.95) 2(-1.15,-0.95) 3(1.15,0)
  silkscreen extent -1.52,-1.45 0.3,1.92, body extent -1.25,-1.5 1.25,1.5, height 1.3
SOT95P280X100-5N [mm] "SOT23, 0.95mm pitch; 5 pin, 1.625mm W X 2.9mm L, IPC Medium Density"
  rect 1.1x0.55 smd: 1(-1.35,0.95) 2(-1.35,0) 3(-1.35,-0.95) 4(1.35,-0.95) 5(1.35,0.95)
  silkscreen extent -1.78,-1.45 0.48,1.87, body extent -1.4,-1.5 1.4,1.5, height 1
SWITCHCRAFT_L712RA [mm] "CONN PWR JACK 2.5X5.5MM SOLDER"
  round 2.5 hole 1.7: 1(2.411,-3.3) 2(0,-6.6) 3(0,0)
  silkscreen extent -22,-8.84 -1.32,2.21, body extent -22,-8.84 1.35,2.18, height 13.9
TPS127 [mm] "1.27 x  1.27mm SMD Test Point Area"
  rect 1.27x1.27 smd paste-1.27: 1(0,0)
  silkscreen extent -0.94,-0.94 0.94,0.94
VCS1625Z [mm] "Vishay Z-Foil sense resistor"
  rect 2.41x1.65 smd: E1(4.19,3.43) E2(4.19,0) I1(0,3.43) I2(0,0)
  silkscreen extent -1,-0.3 5.2,3.7
washer_M3_6mm_0.8mm [mm] "M3 washer accu HAFZ-M3-A4"
  body extent -3,-3 3,3, height 0.8

## Part data
C1: library part CC0603_8.2PF_50V_0.5PF_NP0, "Non-polarised capacitor", Case=0603, Manufacturer=GENERIC, Manufacturer1 ComponentHeight=0.87mm, Manufacturer1 Example=PHYCOMP, Manufacturer1 Part Number=223886715828, Tolerance=±0.5pF, Voltage=50V, Author="CERN DEM JLC", Component Type=Standard, CreateDate=03/12/2007, HelpURL=\\cern.ch\dfs\Applications\Altium\Datasheets\CC0603_NP0_PHYCOMP.pdf, LatestRevisionDate=03/12/2007, Manufacturer Part Number=CC0603_8.2PF_50V_0.5PF_NP0, Mounted=Yes, Part Description="SMD Multilayer Chip Ceramic Capacitor", Part Number=CC0603_8.2PF_50V_0.5PF_NP0, Pin Count=2, Sense=No, SMD=Yes, Socket=No, Status=Preferred, TC=C0G/NP0
C2: library part CC0603_43PF_50V_5%_C0G, "Non-polarised capacitor", Case=0603, Manufacturer=GENERIC, Manufacturer1 ComponentHeight=0.87mm, Manufacturer1 Example=KEMET, Manufacturer1 Part Number=C0603C430J5GACTU, Tolerance=±5%, Voltage=50V, Author="CERN DEM MR", Component Type=Standard, CreateDate=28/06/2017, HelpURL="\\cern.ch\dfs\Applications\Altium\Datasheets\CC0603_C0G_KEMET_(Commercial Grade).pdf", LatestRevisionDate=28/06/2017, Manufacturer Part Number=CC0603_43PF_50V_5%_C0G, Mounted=Yes, Part Description="SMD Multilayer Chip Ceramic Capacitor", Part Number=CC0603_43PF_50V_5%_C0G, Pin Count=2, Sense=No, SMD=Yes, Socket=No, Status=Preferred, TC=C0G/NP0
C3 C5: library part CC0805_4.7NF_50V_5%_NP0, "Non-polarised capacitor", Case=0805, Manufacturer=GENERIC, Manufacturer1 ComponentHeight=0.95mm, Manufacturer1 Example=MURATA, Manufacturer1 Part Number=GRM2195C1H472JA01, Tolerance=±5%, Voltage=50V, Author="CERN DEM MR", Component Type=Standard, CreateDate=30/03/2016, HelpURL=\\cern.ch\dfs\Applications\Altium\Datasheets\CC0805_MURATA_GRM2195C1H472JA01.pdf, LatestRevisionDate=30/03/2016, Manufacturer Part Number=CC0805_4.7NF_50V_5%_NP0, Mounted=Yes, Part Description="SMD Multilayer Chip Ceramic Capacitor", Part Number=CC0805_4.7NF_50V_5%_NP0, Pin Count=2, Sense=No, SMD=Yes, Socket=No, Status=None, TC=C0G/NP0
C4: library part CC0805_47NF_25V_5%_C0G, "Non-polarised capacitor", Case=0805, Manufacturer=GENERIC, Manufacturer1 ComponentHeight=1.4mm, Manufacturer1 Example=KEMET, Manufacturer1 Part Number=C0805C473J3GACTU, Tolerance=±5%, Voltage=25V, Author="CERN DEM JLC", Component Type=Standard, CreateDate=18/01/2011, HelpURL="\\cern.ch\dfs\Applications\Altium\Datasheets\CC0805_C0G_KEMET_(Commercial Grade).pdf", LatestRevisionDate=18/01/2011, Manufacturer Part Number=CC0805_47NF_25V_5%_C0G, Mounted=Yes, Part Description="SMD Multilayer Chip Ceramic Capacitor", Part Number=CC0805_47NF_25V_5%_C0G, Pin Count=2, Sense=No, SMD=Yes, Socket=No, Status=None, TC=C0G/NP0
C6 C7 C8 C9 C10 C11 C12 C13 C14 C15 C34 C35 C36 C42 C45: library part CC0603_100NF_50V_10%_X7R, "Non-polarised capacitor", Case=0603, Manufacturer=GENERIC, Manufacturer1 ComponentHeight=0.87mm, Manufacturer1 Example=PHYCOMP, Manufacturer1 Part Number=223858615649, Tolerance=±10%, Voltage=50V, Author="CERN DEM JLC", Component Type=Standard, CreateDate=03/12/2007, HelpURL=\\cern.ch\dfs\Applications\Altium\Datasheets\CC0603_X7R_PHYCOMP.pdf, LatestRevisionDate=03/12/2007, Manufacturer Part Number=CC0603_100NF_50V_10%_X7R, Mounted=Yes, Part Description="SMD Multilayer Chip Ceramic Capacitor", Part Number=CC0603_100NF_50V_10%_X7R, Pin Count=2, Sense=No, SMD=Yes, Socket=No, Status=Preferred, TC=X7R
C16 C21 C25 C26 C27 C28 C29 C30 C31 C32: library part CC0603_100NF_50V_10%_X5R, "Non-polarised capacitor", Case=0603, Manufacturer=GENERIC, Manufacturer1 ComponentHeight=0.9mm, Manufacturer1 Example=TDK, Manufacturer1 Part Number=C1608X5R1H104K080AA, Tolerance=±10%, Voltage=50V, Author="CERN DEM MR", Component Type=Standard, CreateDate=08/01/2016, HelpURL=\\cern.ch\dfs\Applications\Altium\Datasheets\CC0603_X5R_TDK_C.pdf, LatestRevisionDate=08/01/2016, Manufacturer Part Number=CC0603_100NF_50V_10%_X5R, Mounted=Yes, Part Description="SMD Multilayer Chip Ceramic Capacitor", Part Number=CC0603_100NF_50V_10%_X5R, Pin Count=2, Sense=No, SMD=Yes, Socket=No, Status=None, TC=X5R
C17: library part CC0603_330PF_50V_5%_NP0, "Non-polarised capacitor", Case=0603, Manufacturer=GENERIC, Manufacturer1 ComponentHeight=0.87mm, Manufacturer1 Example=PHYCOMP, Manufacturer1 Part Number=223886715331, Tolerance=±5%, Voltage=50V, Author="CERN DEM JLC", Component Type=Standard, CreateDate=03/12/2007, HelpURL=\\cern.ch\dfs\Applications\Altium\Datasheets\CC0603_NP0_PHYCOMP.pdf, LatestRevisionDate=03/12/2007, Manufacturer Part Number=CC0603_330PF_50V_5%_NP0, Mounted=Yes, Part Description="SMD Multilayer Chip Ceramic Capacitor", Part Number=CC0603_330PF_50V_5%_NP0, Pin Count=2, Sense=No, SMD=Yes, Socket=No, Status=Preferred, TC=C0G/NP0
C18 C22: library part CC0603_4.7NF_50V_10%_X7R, "Non-polarised capacitor", Case=0603, Manufacturer=GENERIC, Manufacturer1 ComponentHeight=0.87mm, Manufacturer1 Example=PHYCOMP, Manufacturer1 Part Number=223858615632, Tolerance=±10%, Voltage=50V, Author="CERN DEM JLC", Component Type=Standard, CreateDate=03/12/2007, HelpURL=\\cern.ch\dfs\Applications\Altium\Datasheets\CC0603_X7R_PHYCOMP.pdf, LatestRevisionDate=03/12/2007, Manufacturer Part Number=CC0603_4.7NF_50V_10%_X7R, Mounted=Yes, Part Description="SMD Multilayer Chip Ceramic Capacitor", Part Number=CC0603_4.7NF_50V_10%_X7R, Pin Count=2, Sense=No, SMD=Yes, Socket=No, Status=Preferred, TC=X7R
C19: library part CC0603_1UF_25V_10%_X7R, "Non-polarised capacitor", Case=0603, Manufacturer=GENERIC, Manufacturer1 ComponentHeight=0.9mm, Manufacturer1 Example=MURATA, Manufacturer1 Part Number=GRM188R71E105KA12D, Tolerance=±10%, Voltage=25V, Author="CERN DEM JLC", Component Type=Standard, CreateDate=18/01/2011, HelpURL=\\cern.ch\dfs\Applications\Altium\Datasheets\CC0603_X7R_MURATA.pdf, LatestRevisionDate=18/01/2011, Manufacturer Part Number=CC0603_1UF_25V_10%_X7R, Mounted=Yes, Part Description="SMD Multilayer Chip Ceramic Capacitor", Part Number=CC0603_1UF_25V_10%_X7R, Pin Count=2, Sense=No, SMD=Yes, Socket=No, Status=None, TC=X7R
C20 C24: library part CC0603_15PF_50V_5%_NP0, "Non-polarised capacitor", Case=0603, Manufacturer=GENERIC, Manufacturer1 ComponentHeight=0.87mm, Manufacturer1 Example=PHYCOMP, Manufacturer1 Part Number=223886715159, Tolerance=±5%, Voltage=50V, Author="CERN DEM JLC", Component Type=Standard, CreateDate=03/12/2007, HelpURL=\\cern.ch\dfs\Applications\Altium\Datasheets\CC0603_NP0_PHYCOMP.pdf, LatestRevisionDate=03/12/2007, Manufacturer Part Number=CC0603_15PF_50V_5%_NP0, Mounted=Yes, Part Description="SMD Multilayer Chip Ceramic Capacitor", Part Number=CC0603_15PF_50V_5%_NP0, Pin Count=2, Sense=No, SMD=Yes, Socket=No, Status=Preferred, TC=C0G/NP0
C23: library part CC0603_33NF_25V_10%_X7R, "Non-polarised capacitor", Case=0603, Manufacturer=GENERIC, Manufacturer1 ComponentHeight=0.87mm, Manufacturer1 Example=PHYCOMP, Manufacturer1 Part Number=223891615643, Tolerance=±10%, Voltage=25V, Author="CERN DEM JLC", Component Type=Standard, CreateDate=03/12/2007, HelpURL=\\cern.ch\dfs\Applications\Altium\Datasheets\CC0603_X7R_PHYCOMP.pdf, LatestRevisionDate=03/12/2007, Manufacturer Part Number=CC0603_33NF_25V_10%_X7R, Mounted=Yes, Part Description="SMD Multilayer Chip Ceramic Capacitor", Part Number=CC0603_33NF_25V_10%_X7R, Pin Count=2, Sense=No, SMD=Yes, Socket=No, Status=Preferred, TC=X7R
C33 C38 C40 C44 C46 C47 C49 C51 C53 C55 C57 C60 C61 C62 C63 C64 C66 C68: library part CC0805_10UF_25V_10%_X5R, "Non-polarised capacitor", Case=0805, Manufacturer=GENERIC, Manufacturer1 ComponentHeight=0.95mm, Manufacturer1 Example=MURATA, Manufacturer1 Part Number=GRM219R61E106KA12D, Tolerance=±10%, Voltage=25V, Author="CERN DEM JLC", Component Type=Standard, CreateDate=25/10/2012, HelpURL=\\cern.ch\dfs\Applications\Altium\Datasheets\CC0805_X5R_MURATA_GRM.pdf, LatestRevisionDate=06/09/2016, Manufacturer Part Number=CC0805_10UF_25V_10%_X5R, Mounted=Yes, Part Description="SMD Multilayer Chip Ceramic Capacitor", Part Number=CC0805_10UF_25V_10%_X5R, Pin Count=2, Sense=No, SMD=Yes, Socket=No, Status=Preferred, TC=X5R
C37: library part CC0603_10NF_50V_10%_X7R, "Non-polarised capacitor", Case=0603, Manufacturer=GENERIC, Manufacturer1 ComponentHeight=0.87mm, Manufacturer1 Example=PHYCOMP, Manufacturer1 Part Number=223858615636, Tolerance=±10%, Voltage=50V, Author="CERN DEM JLC", Component Type=Standard, CreateDate=03/12/2007, HelpURL=\\cern.ch\dfs\Applications\Altium\Datasheets\CC0603_X7R_PHYCOMP.pdf, LatestRevisionDate=03/12/2007, Manufacturer Part Number=CC0603_10NF_50V_10%_X7R, Mounted=Yes, Part Description="SMD Multilayer Chip Ceramic Capacitor", Part Number=CC0603_10NF_50V_10%_X7R, Pin Count=2, Sense=No, SMD=Yes, Socket=No, Status=Preferred, TC=X7R
C39 C41 C43 C48 C50 C52 C54 C56 C58 C59 C65 C67 C69: library part CTE6032-28_10UF_25V_10%_LESR0500, "Polarised capacitor", Case=C, Manufacturer=GENERIC, Manufacturer1 ComponentHeight=2.8mm, Manufacturer1 Example=AVX, Manufacturer1 Part Number=TPSC106K025R0500, Tolerance=±10%, Voltage=25V, Author="CERN DEM JLC", Component Type=Standard, CreateDate=05/05/2008, HelpURL=\\cern.ch\dfs\Applications\Altium\Datasheets\CTE-LESR_AVX_TPS.pdf, LatestRevisionDate=20/01/2009, Manufacturer Part Number=CTE6032-28_10UF_25V_10%_LESR0500, Mounted=Yes, Part Description="Low ESR 0R5 Solid Tantalum Chip Capacitor", Part Number=CTE6032-28_10UF_25V_10%_LESR0500, Pin Count=2, Sense=No, SMD=Yes, Socket=No, Status=Preferred
D1 D2: "Diode Schottky  Anode Pin 1 Cathode Pin 3 (Pas de pin 2)", Case=SOT23-3, Manufacturer="FAIRCHILD SEMICONDUCTOR", Power=200mA, Voltage=30V, Author="CERN DEM JLC", Bonding=No, ComponentHeight=1.30mm, Component Type=Standard, CreateDate=17/09/2009, Device=BAT54, HelpURL=\\cern.ch\dfs\Applications\Altium\Datasheets\BAT54.pdf, LatestRevisionDate=27/05/2010, Manufacturer Part Number=BAT54, Mounted=Yes, PackageDescription="SOT23 3-Leads, Pitch 0.95mm - Body 1.3x2.9mm, IPC Medium Density", Part Description="Single Small Signal Schottky Diode", Part Number=BAT54, Pin Count=3, PressFit=No, Sense=No, SMD=Yes, Socket=No
D3: "Zener Diode", Case=DO-214AA, Manufacturer="FAIRCHILD SEMICONDUCTOR", Power=600W, Voltage=12V, Author="CERN DEM JLC", Bonding=No, ComponentHeight=2.65mm, Component Type=Standard, CreateDate=10/04/2013, Device=SMBJ12A, HelpURL=\\cern.ch\dfs\Applications\Altium\Datasheets\SMBJ.pdf, LatestRevisionDate=10/04/2013, Manufacturer Part Number=SMBJ12A, Mounted=Yes, PackageDescription="DO-214-AA/SMB Diode, Molded Body; 5.34mm L X 3.625mm W X 2.65mm H, IPC Medium Density", Part Description="Uni-Directional Transient Voltage Suppressor Diode", Part Number=SMBJ12A, Pin Count=2, PressFit=No, Sense=No, SMD=Yes, Socket=No
F1 F2 F3: library part FUS0603_BOURNS-SF-0603F050-2, "Fuse", Manufacturer=BOURNS, Manufacturer Part Number=SF-0603F050-2, Author="CERN DEM JLC", ComponentHeight=0.55mm, Component Type=Standard, CreateDate=01/02/2017, Family=Fuse, HelpURL=\\cern.ch\dfs\Applications\Altium\Datasheets\FUSE_BOURNS_SF-0603F.pdf, LatestRevisionDate=01/02/2017, Mounted=Yes, PackageDescription="Chip Fuse, 2-Leads, Body 1.6mm x 0.8mm, IPC Medium Density", Part Description="Thin Film Chip Fuse", Part Number=FUS0603_BOURNS-SF-0603F050-2, Pin Count=2, PressFit=No, Sense=No, SMD=Yes, Socket=No
FL1: library part FIL_MURATA_BNX022-01L, "Block Type EMIFIL (LC Combined)", Manufacturer=MURATA, Manufacturer Part Number=BNX022-01L, Resistance=0.5R, Author="CERN DEM JLC", ComponentHeight=3.3mm, Component Type=Standard, CreateDate=10/10/2012, HelpURL=\\cern.ch\dfs\Applications\Altium\Datasheets\FIL_MURATA_BNX022-01L.pdf, LatestRevisionDate=10/10/2012, Mounted=Yes, Part Description="Block Type EMIFIL (LC Combined) SMD Type, BNX02* Series", Part Number=FIL_MURATA_BNX022-01L, Pin Count=2, Sense=No, SMD=Yes, Socket=No, Status=None
FTG1 FTG2 FTG3 FTG4 FTG5 FTG6: library part FIDUCIAL_TARGET_C100-200, "Fiducial Target", Author="CERN DEM JLC", ComponentHeight=0mm, Component Type="Standard (No BOM)", CreateDate=09/02/2010, Family=Fiducial, HelpURL=Undefined, LatestRevisionDate=04/04/2012, Mounted=No, PackageDescription="Round Fiducial Target, Top Layer, 1.0mm, Top Solder 2.0mm, Keepout =2.0mm", Part Description="Round Fiducial Target, Top Layer, 1.0mm, Top Solder 2.0mm, Keepout =2.0mm", Part Number=FIDUCIAL_TARGET_C100-200, Pin Count=1, Sense=No, SMD=Yes, Socket=No, Status=None
HS1 HS2: library part "HSINK_FISCHER_FK 242 SA 220 O_h", "Heat Sink Without Pad", Manufacturer="FISCHER ELEKTRONIK", Manufacturer Part Number="FK 242 SA 220 O", Author="CERN DEM JLC", ComponentHeight=12.7mm, Component Type=Standard, CreateDate=29/03/2011, HelpURL="\\cern.ch\dfs\Applications\Altium\Datasheets\HSINK_FISCHER_FK 242 SA 220 O.pdf", LatestRevisionDate=10/10/2011, Mounted=Yes, PackageDescription="TO-220 Heat Sink  Rth: 26°C/W - Horizontal Mount", Part Description="TO-220 Heat Sink  Rth: 26°C/W - Horizontal Mount", Part Number="HSINK_FISCHER_FK 242 SA 220 O_h", Pin Count=0, PressFit=No, Sense=No, SMD=No, Socket=No, Status=None
IC1 IC2 IC3 IC4 IC5 IC6 IC7 IC8 IC9 IC10: "Operational Amplifier with Offset 1-8", Case=SOIC8, Manufacturer="LINEAR TECHNOLOGY", Author="CERN DEM JLC", Bonding=No, ComponentHeight=1.75mm, Component Type=Standard, CreateDate=09/03/2011, Device=LT1007CS8#PBF, HelpURL=\\cern.ch\dfs\Applications\Altium\Datasheets\LT1007CS8#PBF.pdf, LatestRevisionDate=09/03/2011, Manufacturer Part Number=LT1007CS8#PBF, Mounted=Yes, PackageDescription="SOIC 8, Pitch 1.27mm - Body 4x5mm, IPC Medium Density", Part Description="Low Noise, High Speed Precision Operational Amplifier", Part Number=LT1007CS8#PBF, Pin Count=7, PressFit=No, Sense=No, SMD=Yes, Socket=No
IC11: library part AD5541LRZ, "16 bit serial DAC", Manufacturer="ANALOG DEVICES", Manufacturer Part Number=AD5541LRZ
IC12: "100mA, Low Noise, LDO Micropower Adjustable Regulator in SOT-23", Case=SOT23, Manufacturer="LINEAR TECHNOLOGY", Author="CERN DEM MR", Bonding=No, ComponentHeight=1mm, Component Type=Standard, CreateDate=17/02/2016, Device=LT1761ES5-BYP#TRMPBF, HelpURL=\\cern.ch\dfs\Applications\Altium\Datasheets\LT1761ES5-SD#TRMPBF.pdf, LatestRevisionDate=17/02/2016, Manufacturer Part Number=LT1761ES5-BYP#TRMPBF, Mounted=Yes, PackageDescription="SOT23, 0.95mm pitch; 5 pin, 1.6mm W X 2.9mm L, IPC Medium Density", Part Description="1.22V to 20V, 100mA, Low Noise, LDO Adjustable Micropower Regulator", Part Number=LT1761ES5-BYP#TRMPBF, Pin Count=5, PressFit=No, Sense=No, SMD=Yes, Socket=No
IC13: library part LTC6655BHLS8-2.5#PBF, "2.5V, 0.25ppm Noise, Low Drift Precision Buffered Voltage Reference", Manufacturer="ANALOG DEVICES", Device=LTC6655BHLS8-2.5, Manufacturer Part Number=LTC6655BHLS8-2.5#PBF, Supplier 1=Digi-Key
IC14: "CONV DC/DC 10W DUAL 12V +-12V PCB", Manufacturer="TDK-Lambda Americas Inc.", Author=TPH, Bonding=No, ComponentHeight=8.5, Component Type=Standard, CreateDate=14.03.2019, Device=CC10-1212DF-E, LatestRevisionDate=14.03.2019, Manufacturer Part Number=CC10-1212DF-E, Mounted=Yes, PackageDescription="CC10 Series, Body 1.400 x 0.890 x 0.335, Regulated", Part Description="CONV DC/DC 10W DUAL 12V +-12V PCB", Part Number=CC10-1212DF-E, Pin Count=7, PressFit=No, Sense=No, SMD=No, Socket=No
J1: library part ESW-113-23-L-D, "Connector Elevated Socket 26 POS 2.54mm, 13.59mm height", Manufacturer=Samtec, Manufacturer Part Number=ESW-108-23-L-D
J2: "Connector Elevated Socket 16 POS 2.54mm, 13.59mm height", Manufacturer=Samtec, Manufacturer Part Number=ESW-108-23-L-D
J3: library part PHOENIX_1757255, "Connector 3 Male", Manufacturer="PHOENIX CONTACT", Manufacturer Part Number="1757255 (MSTBA 2,5/ 3-G-5,08)", Author="CERN DEM JLC", ComponentHeight=8.6mm, Component Type=Standard, CreateDate=10/02/2010, Family=MSTBA, HelpURL=\\cern.ch\dfs\Applications\Altium\Datasheets\PHOENIX_1757255.pdf, LatestRevisionDate=26/04/2010, Mounted=Yes, Part Description="12A, 250V, Pitch 5.08mm, 3 Positions Header", Part Number=PHOENIX_1757255, Pin Count=3, PressFit=No, Sense=No, SMD=No, Socket=No, Status=None
J4: library part FCI_D09S13A4GV00LF, "Connector D-sub 9 Female", Manufacturer=FCI, Manufacturer Part Number=D09S13A4GV00LF, Author="CERN DEM JLC", ComponentHeight=13.86mm, Component Type=Standard, CreateDate=04/10/2017, Family="D-Sub 9F", HelpURL=\\cern.ch\dfs\Applications\Altium\Datasheets\FCI_D09S13A4GV00LF.pdf, LatestRevisionDate=04/10/2017, Mounted=Yes, Part Description="Right Angled D-SUB 9 Female Contacts for PCB  with Harpoons and Female Screwlock (UNC4-40) and Elec. Continuity", Part Number=FCI_D09S13A4GV00LF, Pin Count=11, PressFit=No, Sense=No, SMD=No, Socket=No, Status=None
J5: library part ESW-117-23-L-D, "Connector Elevated Socket 34 POS 2.54mm, 13.59mm height", Manufacturer=Samtec, Manufacturer Part Number=ESW-117-33-L-D-ND
J6: library part SWITCHCRAFT_L712RA, "24V /3. 5A, 2.1mm Diameter Pin, SMD DC Power Supply Connector With  Break Contact", Manufacturer=SWITCHCRAFT, Manufacturer Part Number=L712RA, Author=GK, ComponentHeight=11mm, Component Type=Standard, CreateDate=15.02.2011, Family=Jack, HelpURL=\\cern.ch\dfs\Applications\Altium\Datasheets\LUMBERG_161314.pdf, LatestRevisionDate=20.07.2011, Mounted=Yes, Part Description="12V/5A, 2.5mm Diameter Pin, THT DC Power Supply Connector With  Break Contact", Part Number=SWITCHCRAFT_L712RA, Pin Count=3, PressFit=No, Sense=No, SMD=No, Socket=No, Status=None
J7: library part PHOENIX_1757022, "Phoenix Contact 5.08mm pitch terminal plug, 3 ways", Manufacturer="Phoenix Contact", Manufacturer Part Number="1757022 (MSTB 2,5/ 3-ST-5,08)", Mates with="1757255 (MSTBA 2,5/ 3-G-5,08)"
L1 L2 L3 L4 L5 L6 L7: library part IND_10UH_10%_MURATA-PS_8400, "Inductor With Core", Manufacturer="MURATA POWER SOLUTIONS", Manufacturer Part Number=84103C, Power=950mA, Resistance=0.24R, Tolerance=±10%, Author="CERN DEM JLC", ComponentHeight=2.9mm, Component Type=Standard, CreateDate=02.07.2012, HelpURL=\\cern.ch\dfs\Applications\Altium\Datasheets\IND_MURATA-PS_8400.pdf, LatestRevisionDate=02.07.2012, Mounted=Yes, Part Description="Miniature Surface Mount Power Inductor (8400 Serie)", Part Number=IND_10UH_10%_MURATA-PS_8400, Pin Count=2, Sense=No, SMD=Yes, Socket=No, Status=None
Q1 Q2: "Complementary Silicon Plastic Power Transistor, 3-Pin TO-220, Tube", Manufacturer="On Semiconductor", ComponentLink1Description="Manufacturer URL", ComponentLink1URL=http://www.onsemi.com/, ComponentLink2Description=Datasheet, ComponentLink2URL=http://www.onsemi.com/pub_link/Collateral/TIP29B-D.PDF, ComponentLink3Description="Package Specification", ComponentLink3URL=http://www.onsemi.com/pub_link/Collateral/221A-09.PDF, DatasheetVersion="Rev. 12", Device=TIP29A, fT Min (MHz)=3, IC Continuous (A)=1, Manufacturer Part Number=TIP29A, Mounting Technology="Through Hole", Note=0, PackageDescription="3-Pin Flange Mount, Vertical Straight Lead, Body 9.97 x 4.445 mm, Pitch 2.54 mm", PackageReference=TO-220-3-221A-09, PackageVersion="Rev. AG, 09/2011", Packing=Tube, PartNumber=TIP29A, Polarity=NPN, RoHS=FALSE
R1 R7 R27 R29 R31 R32: library part R0603_1K_0.1%_0.063W_10PPM, "Resistor - 0.1%", Case=0603, Manufacturer=GENERIC, Manufacturer1 ComponentHeight=0.55mm, Manufacturer1 Example="TYCO HOLSWORTHY", Manufacturer1 Part Number=RN73C1J1K0BTG, Power=0.063W, Tolerance=±0.1%, Author="CERN DEM BC", Component Type=Standard, CreateDate=23/05/2016, HelpURL=\\cern.ch\dfs\Applications\Altium\Datasheets\R0603_Tyco_RN73.pdf, LatestRevisionDate=23/05/2016, Manufacturer Part Number=R0603_1K_0.1%_0.063W_10PPM, Mounted=Yes, Part Description="Thin Film Chip Resistor", Part Number=R0603_1K_0.1%_0.063W_10PPM, Pin Count=2, PressFit=No, Sense=No, SMD=Yes, Socket=No, Status="Not Recommended", TC=±10ppm
R2: library part R0603_100K_0.1%_0.063W_10PPM, "Resistor - 0.1%", Case=0603, Manufacturer=GENERIC, Manufacturer1 ComponentHeight=0.55mm, Manufacturer1 Example="TYCO HOLSWORTHY", Manufacturer1 Part Number=RN73C1J100KBTDF, Power=0.063W, Tolerance=±0.1%, Author="CERN DEM JLC", Component Type=Standard, CreateDate=03/12/2007, HelpURL=\\cern.ch\dfs\Applications\Altium\Datasheets\R0603_Tyco_RN73.pdf, LatestRevisionDate=13/03/2008, Manufacturer Part Number=R0603_100K_0.1%_0.063W_10PPM, Mounted=Yes, Part Description="Thin Film Chip Resistor", Part Number=R0603_100K_0.1%_0.063W_10PPM, Pin Count=2, PressFit=No, Sense=No, SMD=Yes, Socket=No, Status="Not Recommended", TC=±10ppm
R3: library part R0603_20K_0.1%_0.063W_10PPM, "Resistor - 0.1%", Case=0603, Manufacturer=GENERIC, Manufacturer1 ComponentHeight=0.5mm, Manufacturer1 Example="TYCO HOLSWORTHY", Manufacturer1 Part Number=RN73C1J20KBTDF, Power=0.063W, Tolerance=±0.1%, Author="CERN DEM JLC", Component Type=Standard, CreateDate=03/12/2007, HelpURL=\\cern.ch\dfs\Applications\Altium\Datasheets\R0603_Tyco_RN73.pdf, LatestRevisionDate=13/03/2008, Manufacturer Part Number=R0603_20K_0.1%_0.063W_10PPM, Mounted=Yes, Part Description="Thin Film Chip Resistor", Part Number=R0603_20K_0.1%_0.063W_10PPM, Pin Count=2, PressFit=No, Sense=No, SMD=Yes, Socket=No, Status="Not Recommended", TC=±10ppm
R4 R8: library part R0603_16R_1%_0.1W_100PPM, "Resistor - 1%", Case=0603, Manufacturer=GENERIC, Manufacturer1 ComponentHeight=0.55mm, Manufacturer1 Example="NIC COMPONENT", Manufacturer1 Part Number=NRC06F16R0TRF, Power=0.1W, Tolerance=±1%, Author="CERN DEM JLC", Component Type=Standard, CreateDate=03/12/2007, HelpURL=\\cern.ch\dfs\Applications\Altium\Datasheets\R0603_NIC_NRC.pdf, LatestRevisionDate=13/03/2008, Manufacturer Part Number=R0603_16R_1%_0.1W_100PPM, Mounted=Yes, Part Description="General Purpose Thick Film Chip Resistor", Part Number=R0603_16R_1%_0.1W_100PPM, Pin Count=2, PressFit=No, Sense=No, SMD=Yes, Socket=No, Status=Preferred, TC=±100ppm/°C
R5 R9 R11 R13 R15: library part R0603_10K_1%_0.1W_100PPM, "Resistor - 1%", Case=0603, Manufacturer=GENERIC, Manufacturer1 ComponentHeight=0.55mm, Manufacturer1 Example="NIC COMPONENT", Manufacturer1 Part Number=NRC06F1002TRF, Power=0.1W, Tolerance=±1%, Author="CERN DEM JLC", Component Type=Standard, CreateDate=03/12/2007, HelpURL=\\cern.ch\dfs\Applications\Altium\Datasheets\R0603_NIC_NRC.pdf, LatestRevisionDate=13/03/2008, Manufacturer Part Number=R0603_10K_1%_0.1W_100PPM, Mounted=Yes, Part Description="General Purpose Thick Film Chip Resistor", Part Number=R0603_10K_1%_0.1W_100PPM, Pin Count=2, PressFit=No, Sense=No, SMD=Yes, Socket=No, Status=Preferred, TC=±100ppm/°C
R6: "Current sense resistor, 10 Ohm, 500 mW, +-0.5%, 0.05ppm", Manufacturer="Vishay Foil Resistors", Device=Y160710R0000D9R, Manufacturer Part Number=Y160710R0000D9R, Supplier 1=Digi-Key
R10 R14 R16 R18 R23 R25 R26: library part R0603_470R_1%_0.1W_100PPM, "Resistor - 1%", Case=0603, Manufacturer=GENERIC, Manufacturer1 ComponentHeight=0.55mm, Manufacturer1 Example="NIC COMPONENT", Manufacturer1 Part Number=NRC06F4700TRF, Power=0.1W, Tolerance=±1%, Author="CERN DEM JLC", Component Type=Standard, CreateDate=03/12/2007, HelpURL=\\cern.ch\dfs\Applications\Altium\Datasheets\R0603_NIC_NRC.pdf, LatestRevisionDate=13/03/2008, Manufacturer Part Number=R0603_470R_1%_0.1W_100PPM, Mounted=Yes, Part Description="General Purpose Thick Film Chip Resistor", Part Number=R0603_470R_1%_0.1W_100PPM, Pin Count=2, PressFit=No, Sense=No, SMD=Yes, Socket=No, Status=Preferred, TC=±100ppm/°C
R12 R19 R21 R28: library part R0603_1K_1%_0.1W_100PPM, "Resistor - 1%", Case=0603, Manufacturer=GENERIC, Manufacturer1 ComponentHeight=0.55mm, Manufacturer1 Example="NIC COMPONENT", Manufacturer1 Part Number=NRC06F1001TRF, Power=0.1W, Tolerance=±1%, Author="CERN DEM JLC", Component Type=Standard, CreateDate=03/12/2007, HelpURL=\\cern.ch\dfs\Applications\Altium\Datasheets\R0603_NIC_NRC.pdf, LatestRevisionDate=13/03/2008, Manufacturer Part Number=R0603_1K_1%_0.1W_100PPM, Mounted=Yes, Part Description="General Purpose Thick Film Chip Resistor", Part Number=R0603_1K_1%_0.1W_100PPM, Pin Count=2, PressFit=No, Sense=No, SMD=Yes, Socket=No, Status=Preferred, TC=±100ppm/°C
R17 R24 R33 R34 R35 R36 R37 R38 R41 R42 R43 R44 R47 R48 R49 R50: library part R0603_0R_JUMPER, "Resistor", Case=0603, Manufacturer=GENERIC, Manufacturer1 ComponentHeight=0.55mm, Manufacturer1 Example="NIC COMPONENT", Manufacturer1 Part Number=NRC06Z0, Author="CERN DEM JLC", Component Type=Standard, CreateDate=03/12/2007, HelpURL=\\cern.ch\dfs\Applications\Altium\Datasheets\R0603_NIC_NRC.pdf, LatestRevisionDate=13/03/2008, Manufacturer Part Number=R0603_0R_JUMPER, Mounted=Yes, Part Description="1A (0.05R Max DC Resistance) Zero Ohm Jumper", Part Number=R0603_0R_JUMPER, Pin Count=2, PressFit=No, Sense=No, SMD=Yes, Socket=No, Status=Preferred
R20: library part R0603_2R_1%_0.1W_200PPM, "Resistor - 1%", Case=0603, Manufacturer=GENERIC, Manufacturer1 ComponentHeight=0.65mm, Manufacturer1 Example="YAGEO PHYCOMP", Manufacturer1 Part Number="232270462008L or RC0603FR-072RL", Power=0.1W, Tolerance=±1%, Author="CERN DEM JLC", Component Type=Standard, CreateDate=03/12/2007, HelpURL=\\cern.ch\dfs\Applications\Altium\Datasheets\R0603_Tyco_RN73.pdf, LatestRevisionDate=17/10/2012, Manufacturer Part Number=R0603_2R_1%_0.1W_200PPM, Mounted=Yes, Part Description="General Purpose Thick Film Chip Resistor", Part Number=R0603_2R_1%_0.1W_200PPM, Pin Count=2, PressFit=No, Sense=No, SMD=Yes, Socket=No, Status=Preferred, TC=±200ppm/°C
R22: library part R0603_24K_1%_0.1W_100PPM, "Resistor - 1%", Case=0603, Manufacturer=GENERIC, Manufacturer1 ComponentHeight=0.55mm, Manufacturer1 Example="NIC COMPONENT", Manufacturer1 Part Number=NRC06F2402TRF, Power=0.1W, Tolerance=±1%, Author="CERN DEM JLC", Component Type=Standard, CreateDate=03/12/2007, HelpURL=\\cern.ch\dfs\Applications\Altium\Datasheets\R0603_NIC_NRC.pdf, LatestRevisionDate=13/03/2008, Manufacturer Part Number=R0603_24K_1%_0.1W_100PPM, Mounted=Yes, Part Description="General Purpose Thick Film Chip Resistor", Part Number=R0603_24K_1%_0.1W_100PPM, Pin Count=2, PressFit=No, Sense=No, SMD=Yes, Socket=No, Status=Preferred, TC=±100ppm/°C
R30: library part R0603_10R_1%_0.1W_200PPM, "Resistor - 1%", Case=0603, Manufacturer=GENERIC, Manufacturer1 ComponentHeight=0.55mm, Manufacturer1 Example="NIC COMPONENT", Manufacturer1 Part Number=NRC06F10R0TRF, Power=0.1W, Tolerance=±1%, Author="CERN DEM JLC", Component Type=Standard, CreateDate=03/12/2007, HelpURL=\\cern.ch\dfs\Applications\Altium\Datasheets\R0603_NIC_NRC.pdf, LatestRevisionDate=24/06/2009, Manufacturer Part Number=R0603_10R_1%_0.1W_200PPM, Mounted=Yes, Part Description="General Purpose Thick Film Chip Resistor", Part Number=R0603_10R_1%_0.1W_200PPM, Pin Count=2, PressFit=No, Sense=No, SMD=Yes, Socket=No, Status=Preferred, TC=±200ppm/°C